# Altium PCB Sampler.PCBDOC (part 1 of 7)
Units mil, origin at the board's own origin, x right, y up, seen from the top; angles counter-clockwise.
Board outline 6299 x 3937 mil, 4 copper layers (Top, GP1(GND), L3, Bot), stack 64.883 mil thick; 567 components, 323 nets, 1698 pads, 817 vias.
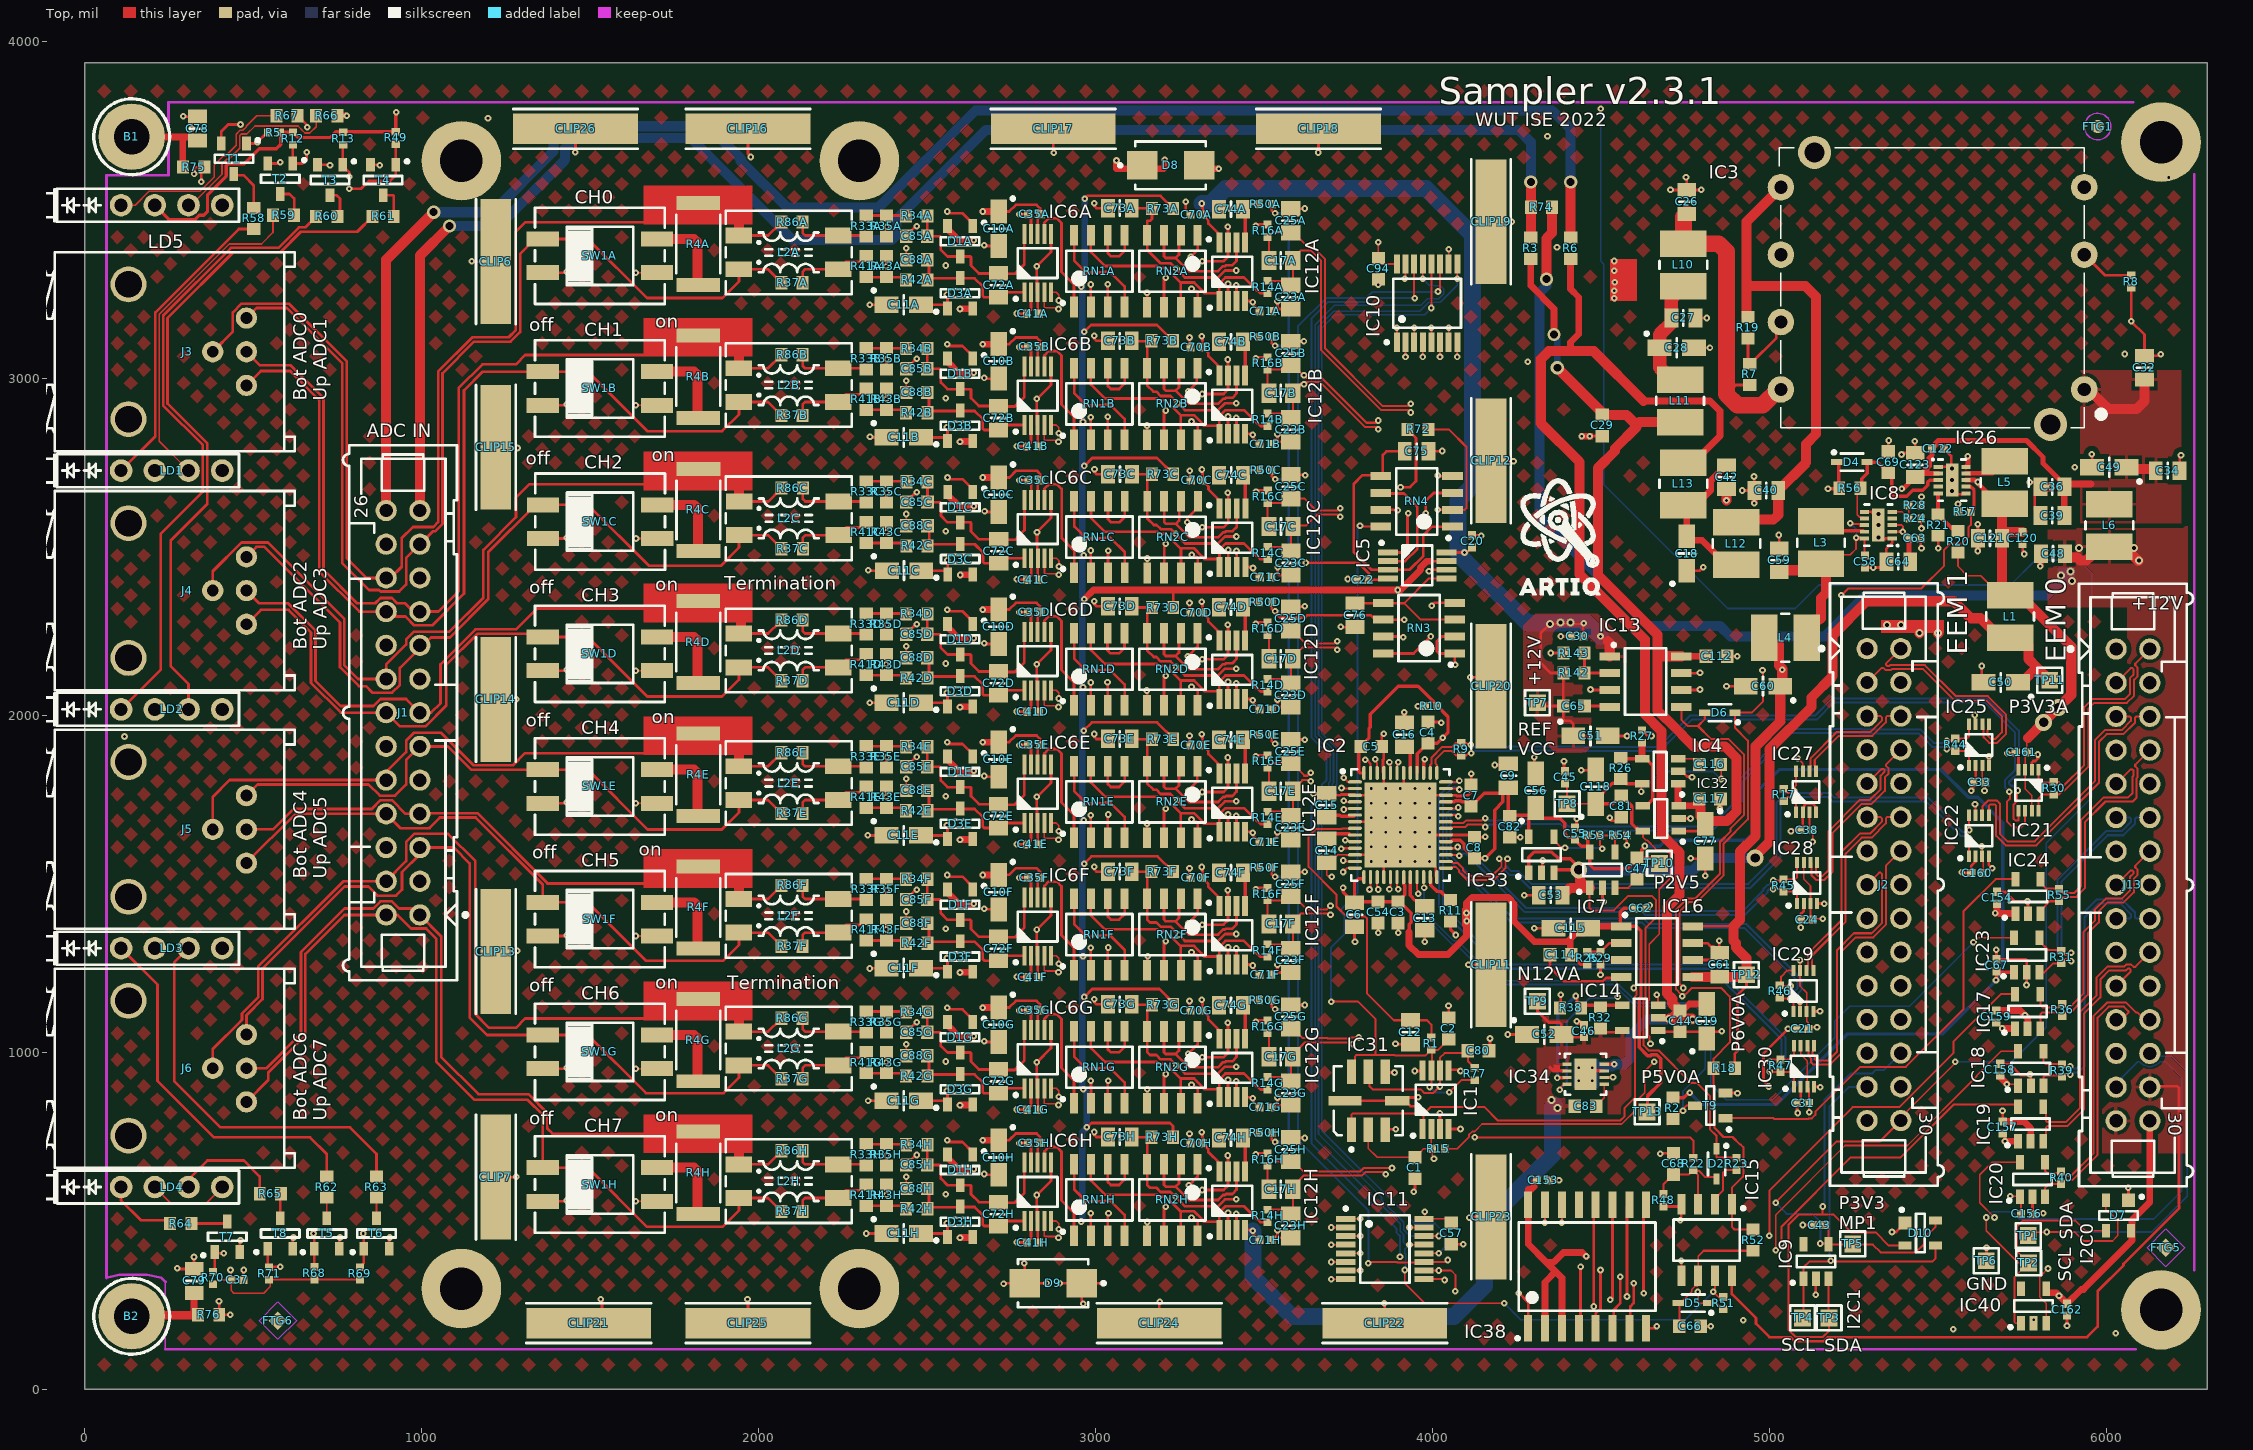
[diagram p0: Top view]
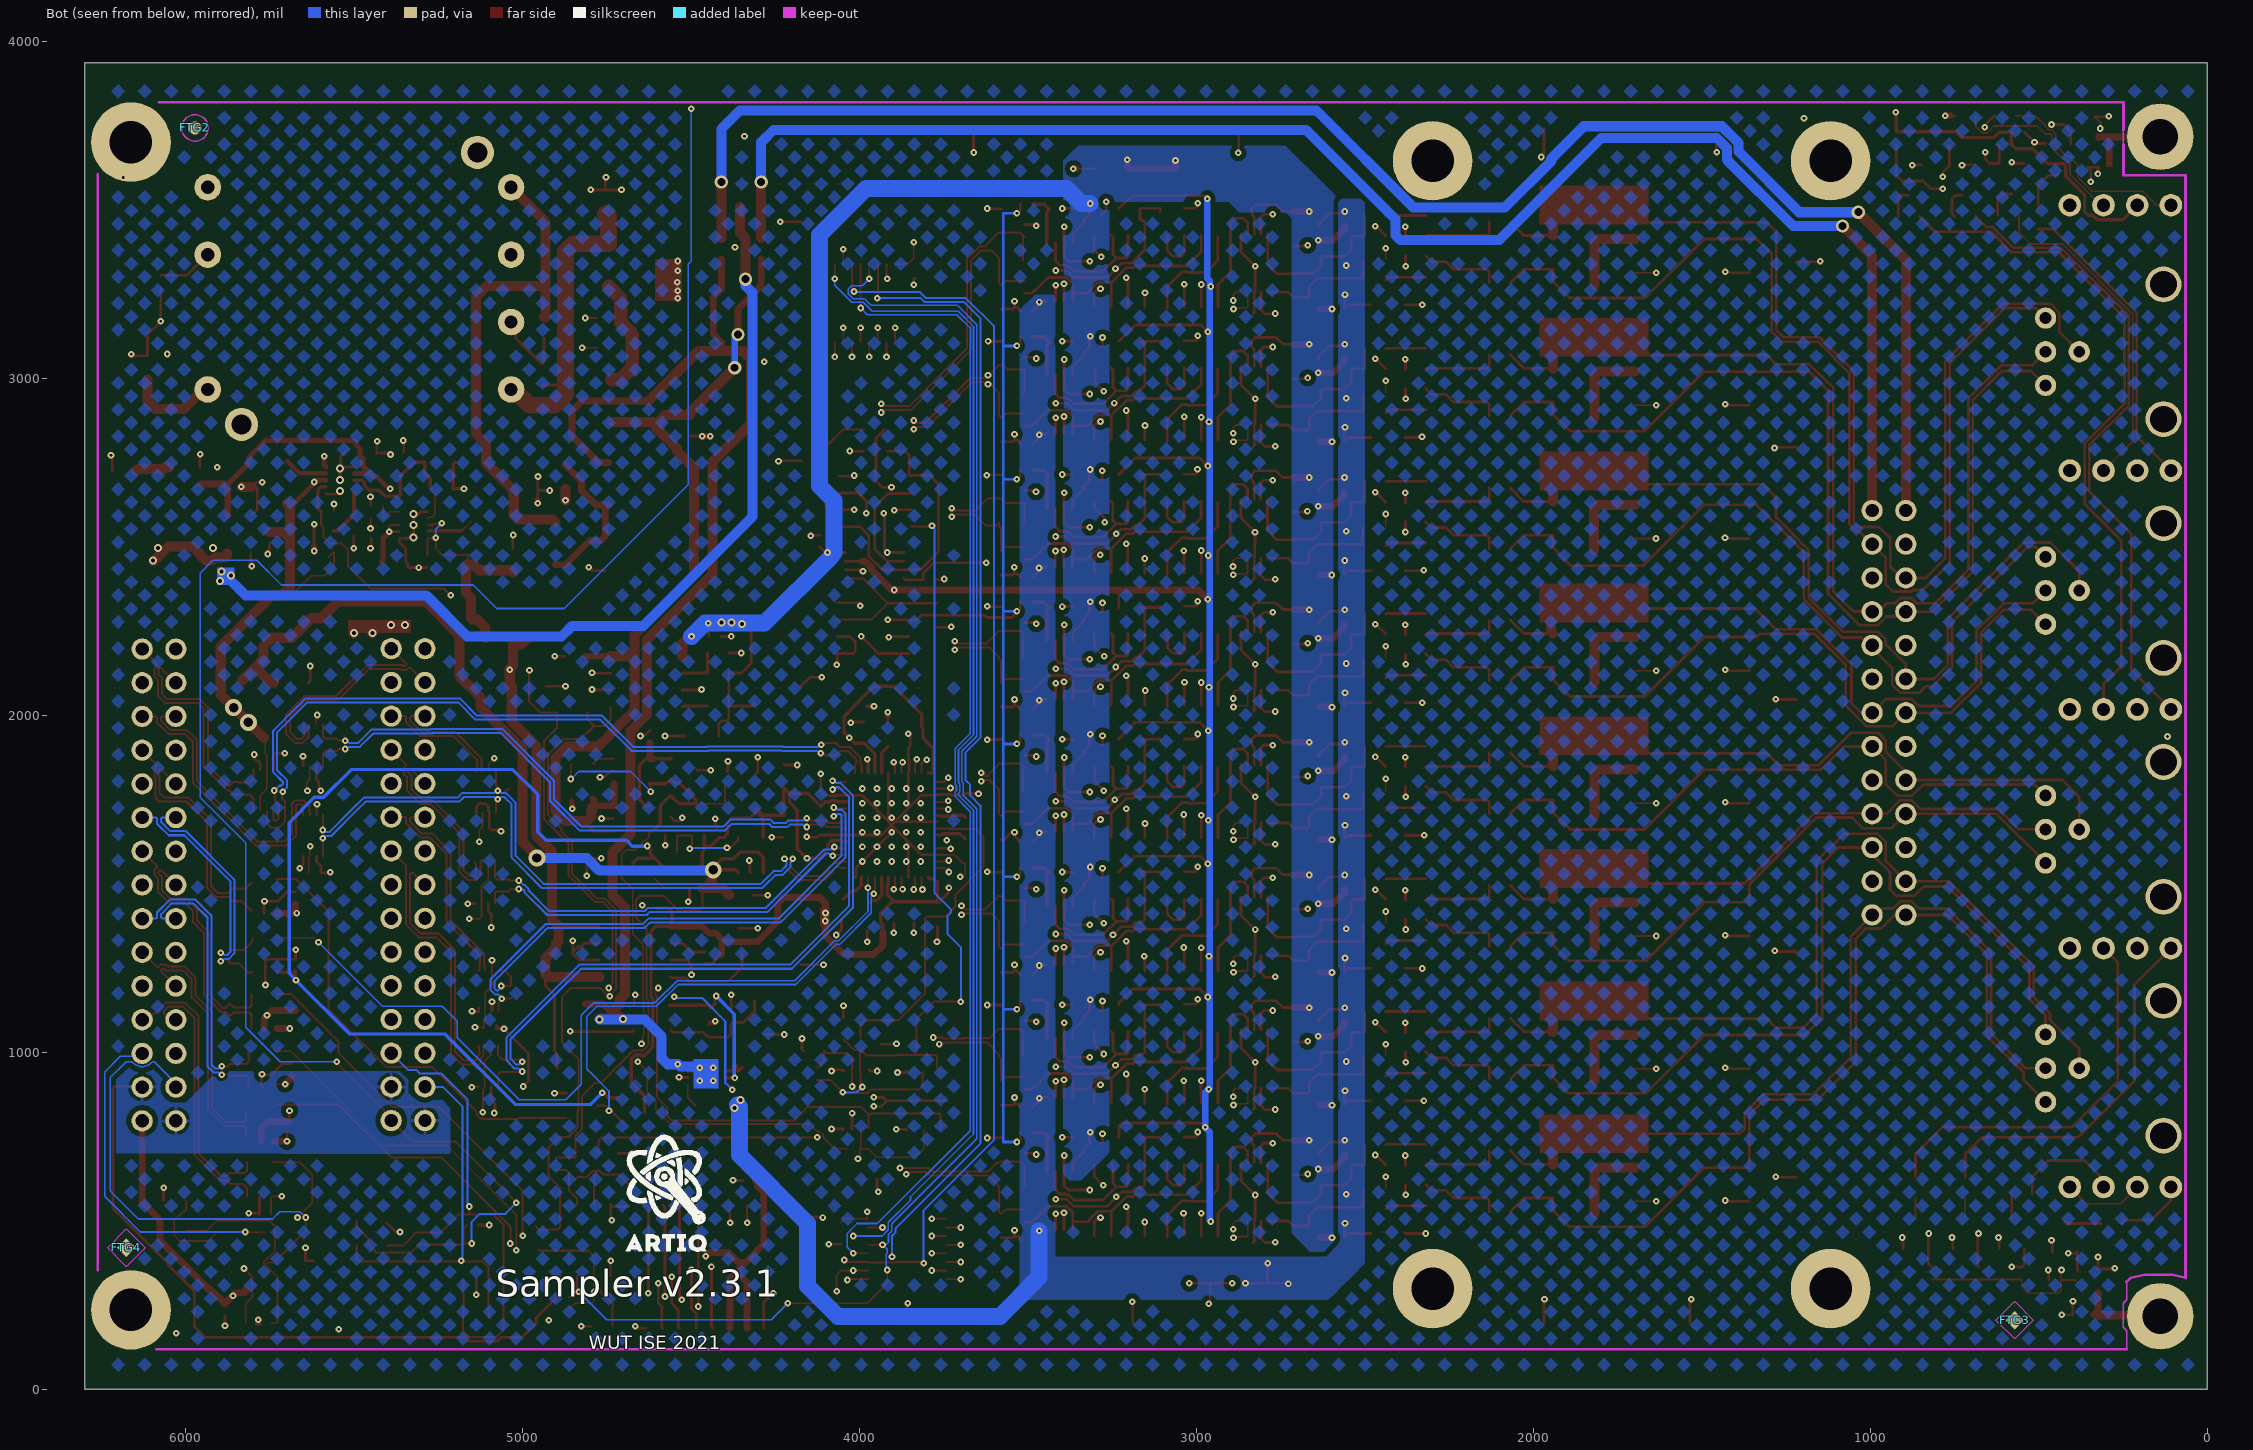
[diagram p1: Bot view, seen from below]
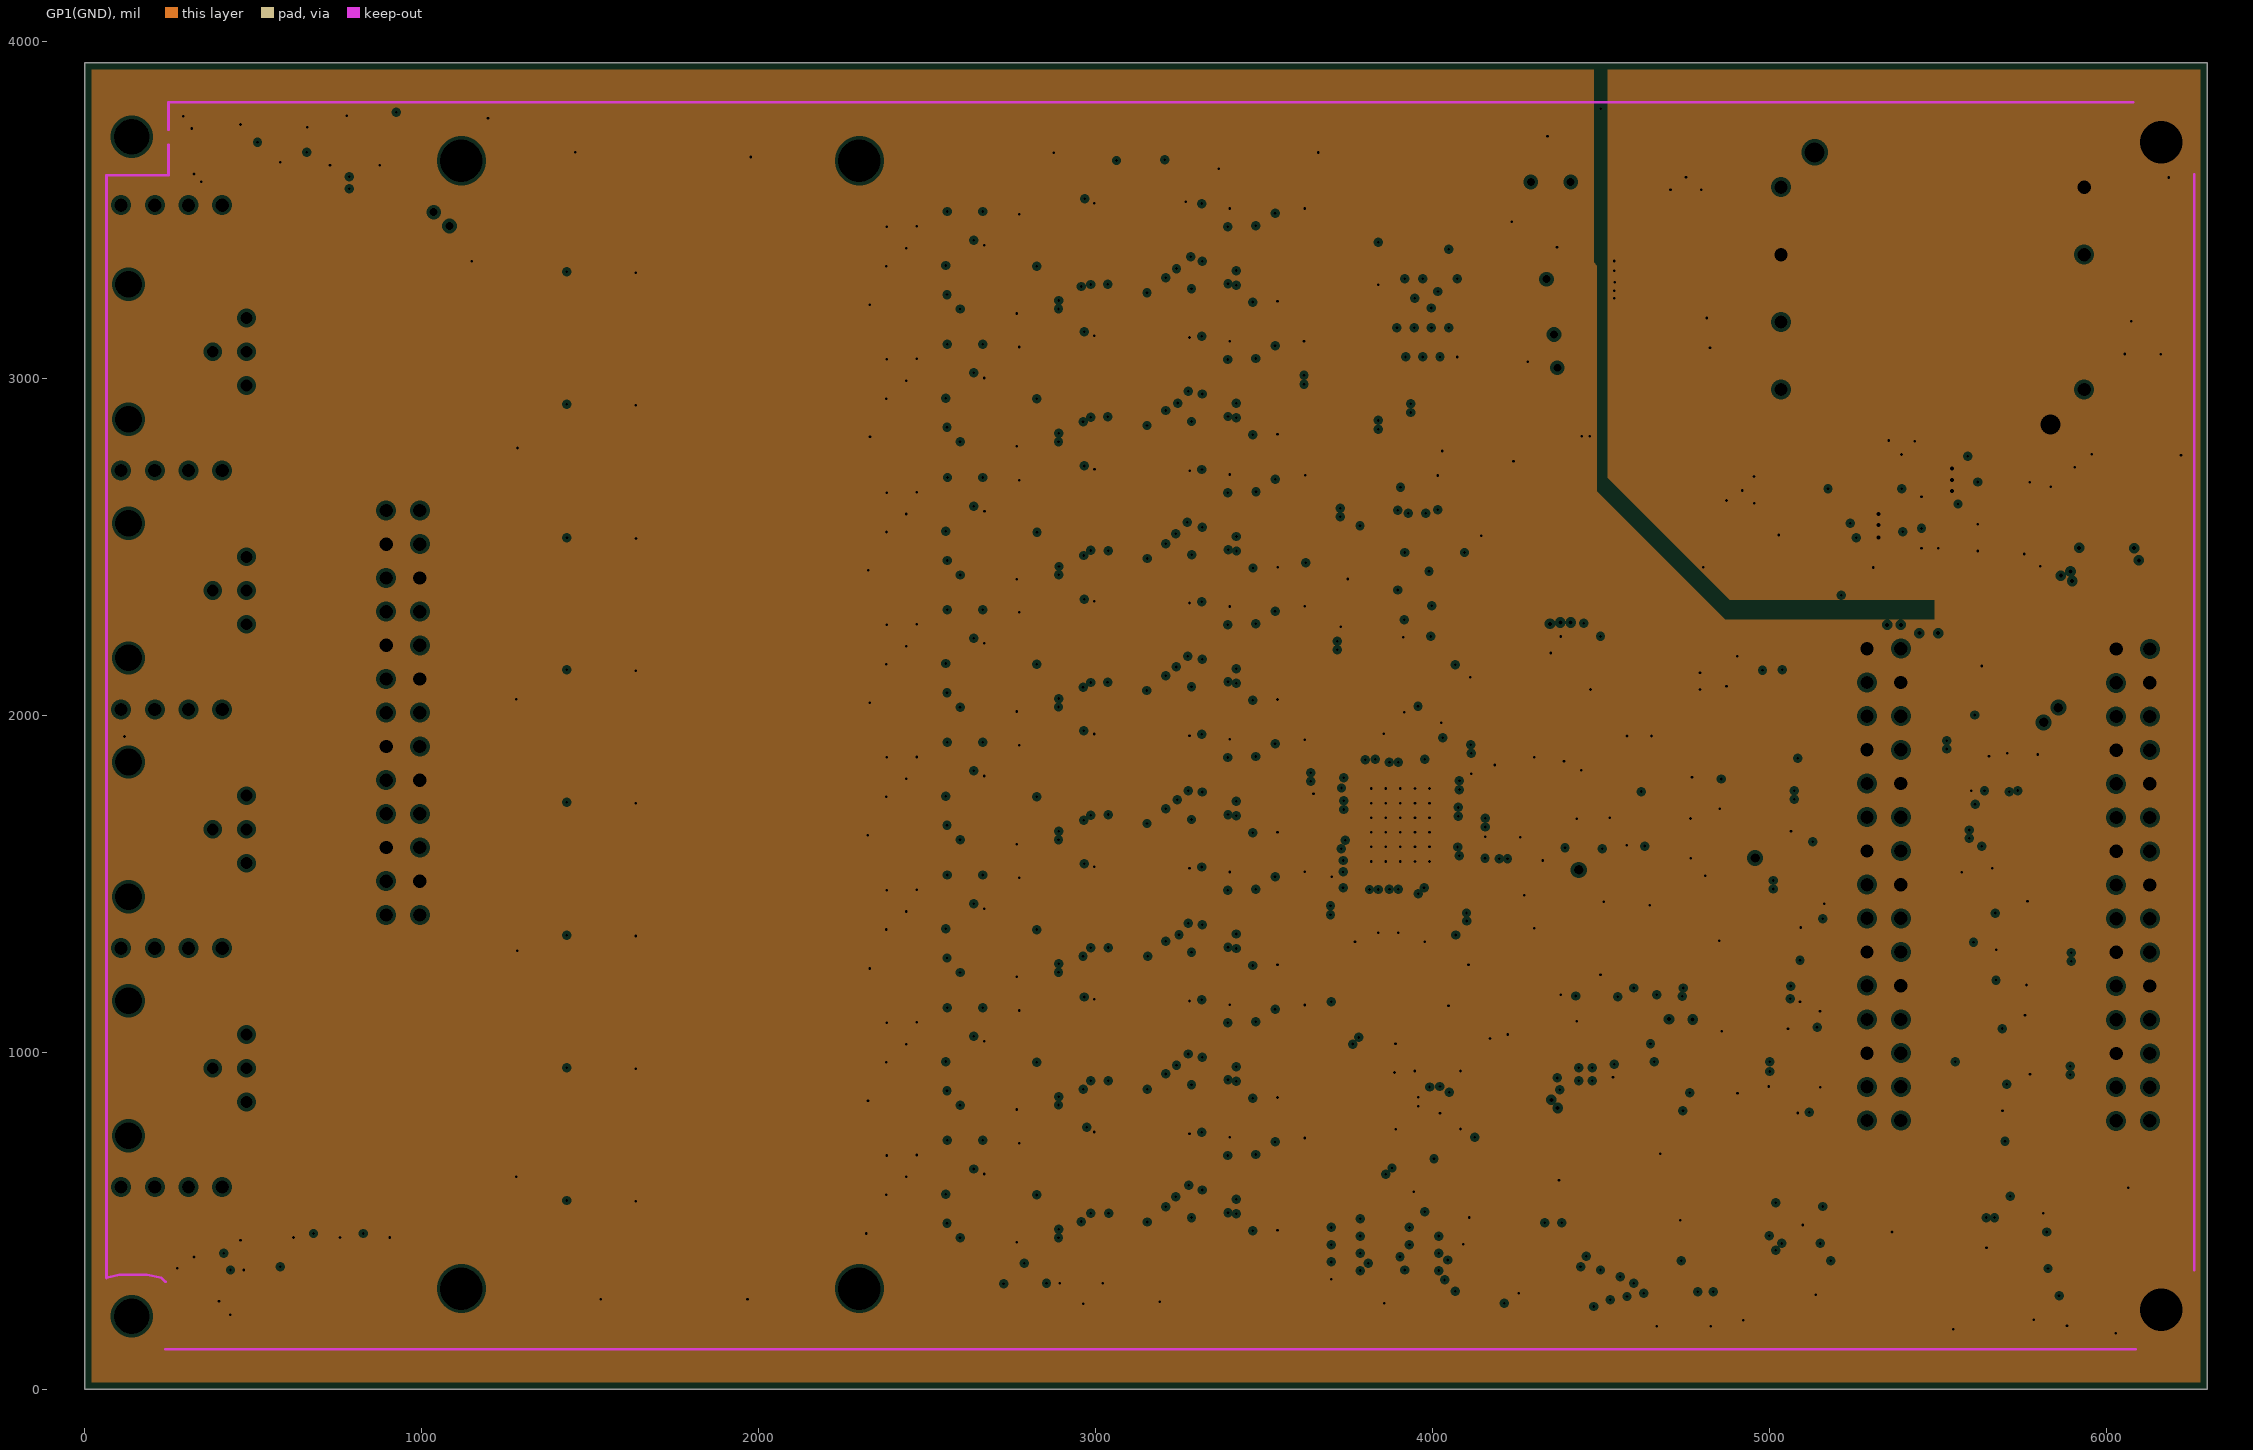
[diagram p2: GP1(GND), clearances drawn from the general rule]
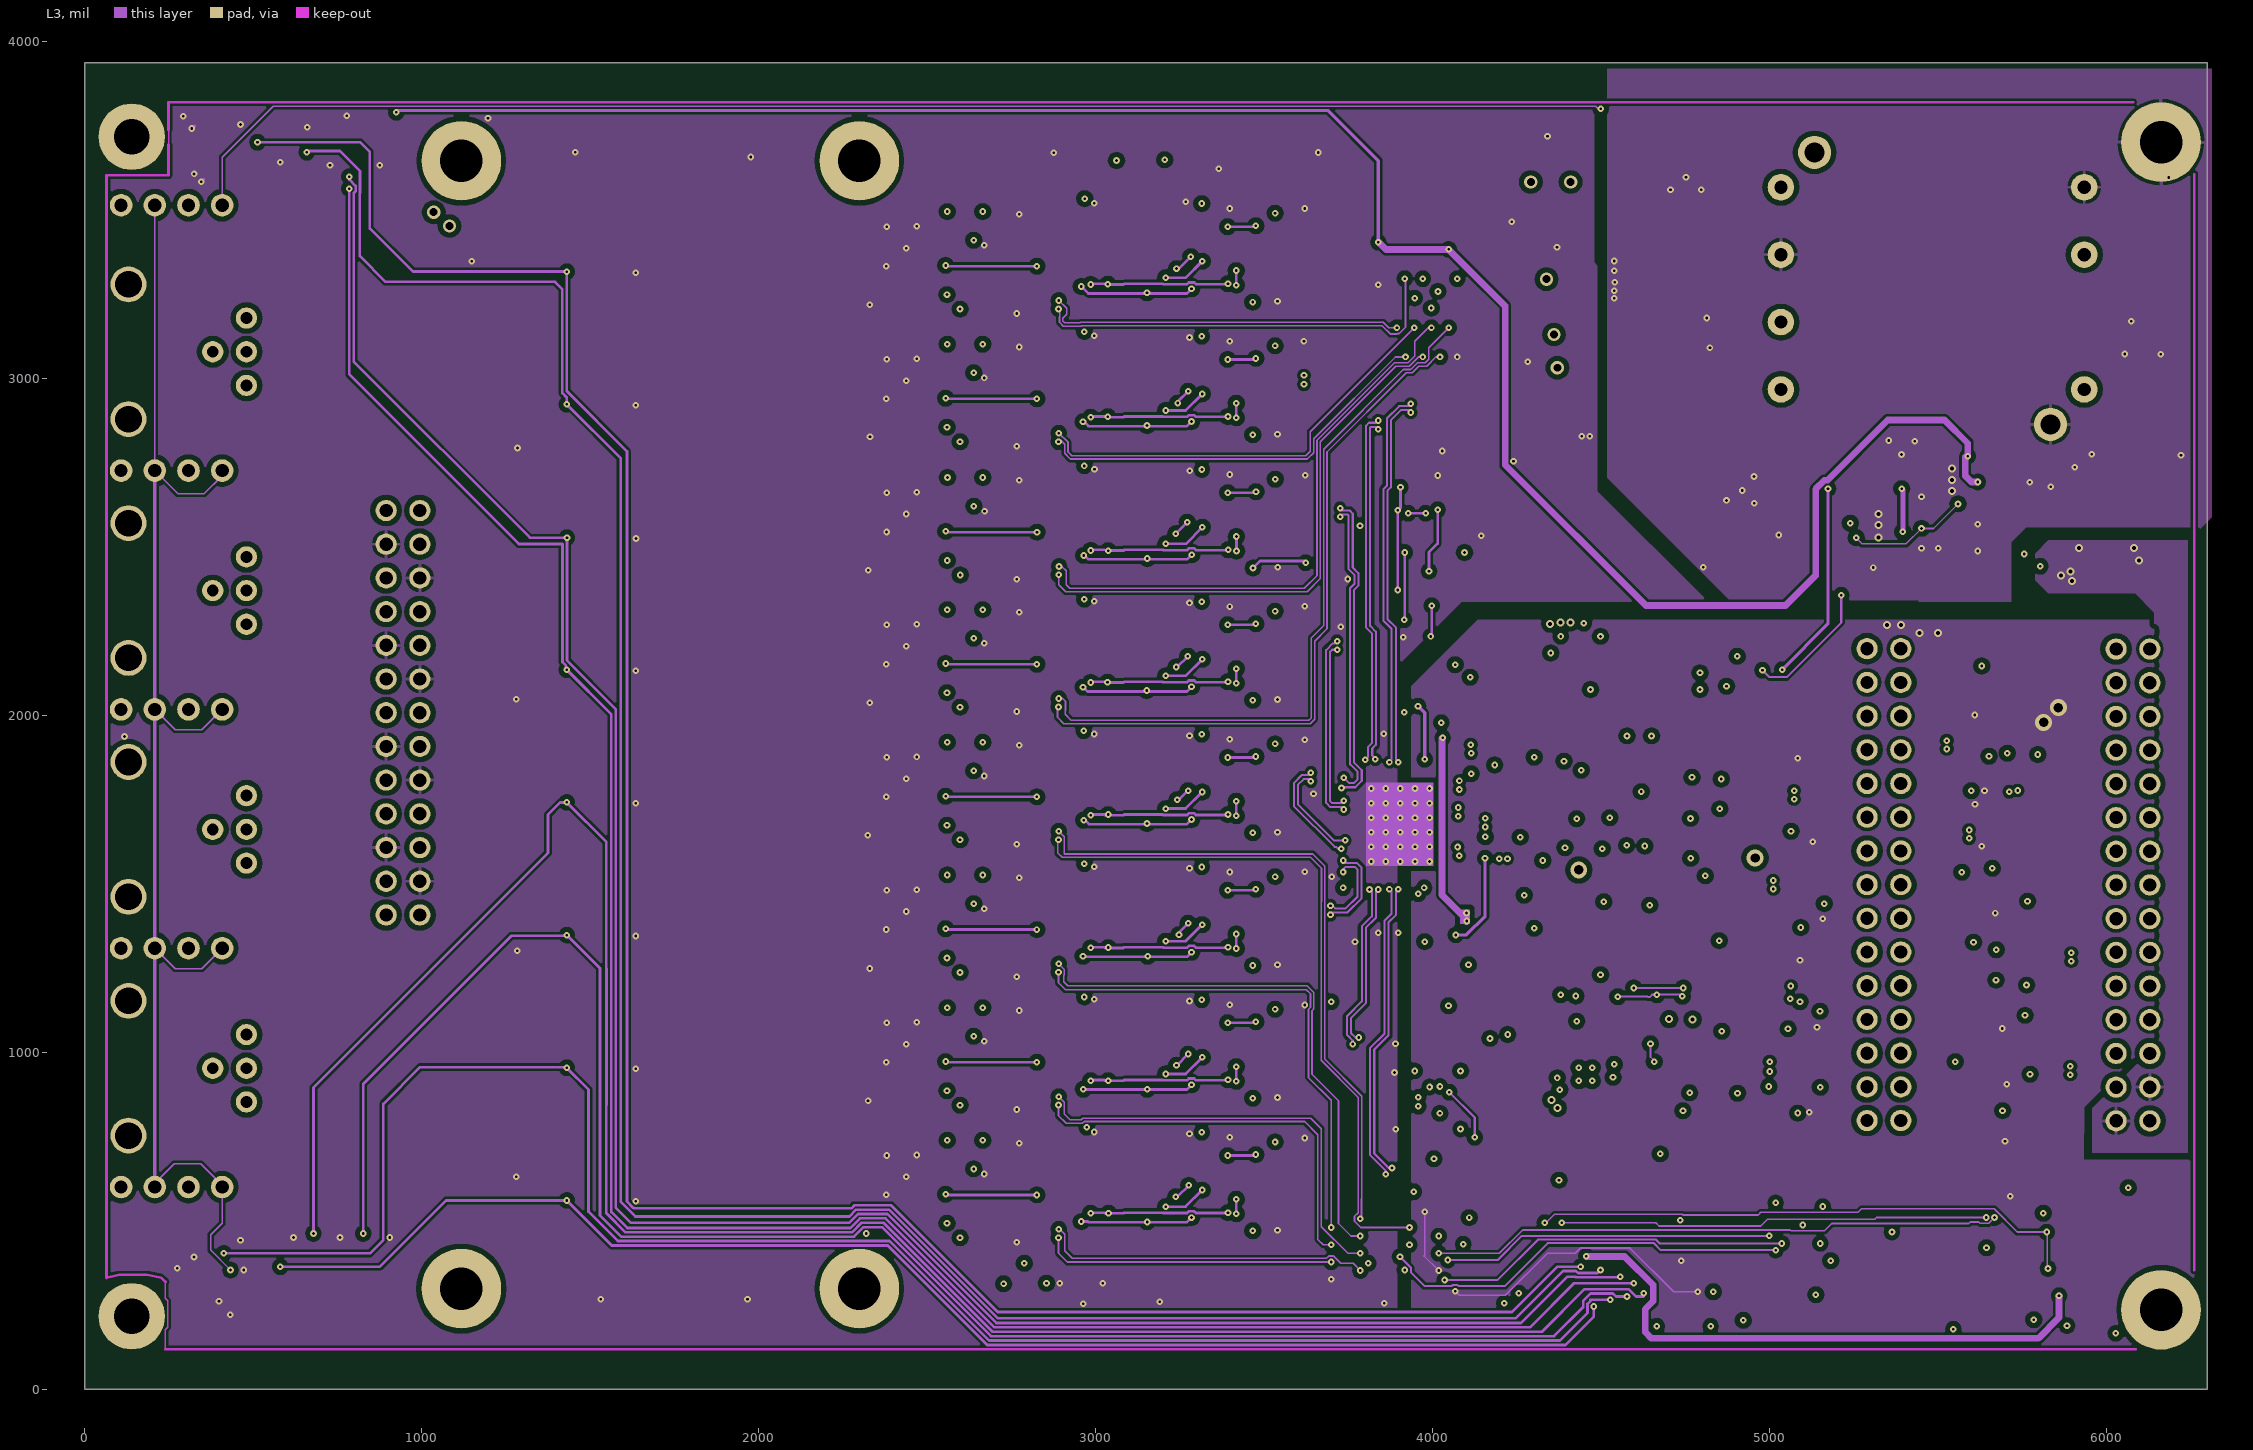
[diagram p3: L3]
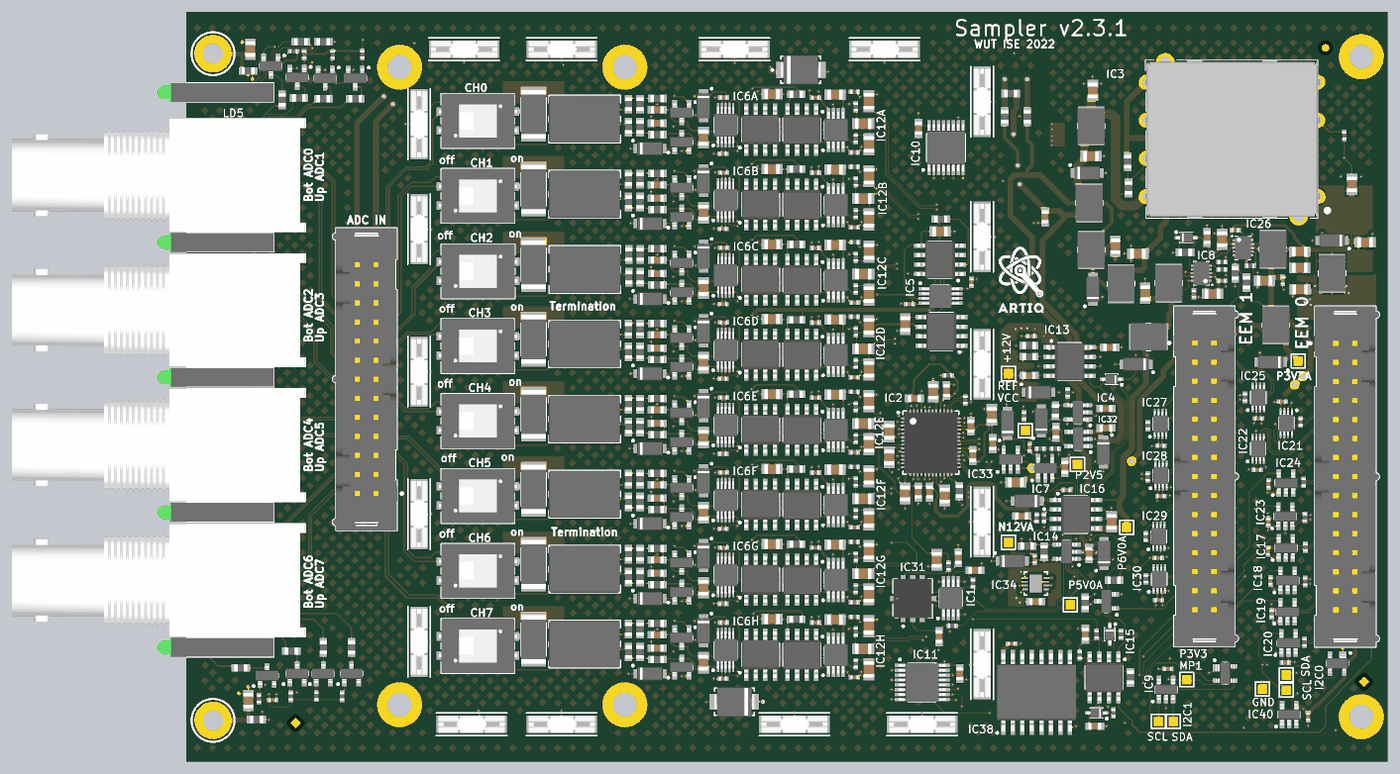
[diagram p9: 3D render of the assembled board from above, using the file's embedded part models]

## Layer stack, top to bottom
TopSolder: solder mask 0.4, Solder Resist, Dk 3.5
Top: signal copper 2.284
Dielectric1: core 7.087, FR-4, Dk 4.8
GP1(GND): plane copper 1.417, net GND
Dielectric 3: prepreg 43.307, Dk 4.2
L3: signal copper 1.417
Dielectric2: core 7.087, FR-4, Dk 4.2
Bot: signal copper 2.284
BottomSolder: solder mask 0.4, Solder Resist, Dk 3.5

## Board outline
0,0 6299,0 6299,3937 0,3937

## Design rules (kind name [scope] priority, off if disabled: settings)
AcuteAngle [All] p1: minimum=6.00000000000000E+0001 checktracksonly=FALSE
Clearance Clearance_DIFF [(InDifferentialPairClass('All Differential Pairs'))] p1: gap=5 ignorepadtopadclearanceinfootprint=FALSE except(0: Arc-Hole Track-Hole SMDPad-Hole THPad-Hole Via-Hole Fill-Hole Poly-Hole Region-Hole Text-Hole; 10: Arc-Poly Track-Poly SMDPad-Poly THPad-Poly Via-Poly Fill-Poly Poly-Poly Poly-Region Poly-Text)
Clearance [All] p2: gap=5 ignorepadtopadclearanceinfootprint=FALSE except(0: Arc-Hole Track-Hole SMDPad-Hole THPad-Hole Via-Hole Fill-Hole Poly-Hole Region-Hole Text-Hole; 8: Track-Poly; 15: Arc-Poly SMDPad-Poly THPad-Poly Via-Poly Fill-Poly Poly-Poly)
ComponentClearance [All] p1 off: gap=10 collisioncheckmode=3 verticalgap=10 showdistances=FALSE
DiffPairsRouting [All] p1: maxlimit=7 minlimit=6 mostfreqgap=6 toplayer_minwidth=5 toplayer_maxwidth=6 toplayer_prefwidth=6 midlayer1_minwidth=5 midlayer1_maxwidth=6 midlayer1_prefwidth=6 bottomlayer_minwidth=5 bottomlayer_maxwidth=6 bottomlayer_prefwidth=6 maxuncoupledlength=500
FabricationTestPointUsage TestPointUsage [All] p1: valid=0 allowmultiple=FALSE
FabricationTestpoint Testpoint [All] p1: side=3 testpointundercomponent=TRUE minsize=40 maxsize=100 preferedsize=60 minholesize=20 maxholesize=40 preferedholesize=32 testpointgrid=1 allowsidetop=TRUE allowsidebottom=TRUE usegrid=TRUE gridtolerance=0.01
Height [All] p1 off: minheight=0 maxheight=1000 prefheight=500
HoleSize [All] p1: absolutevalues=TRUE maxlimit=150 minlimit=1 maxpercent=80.000 minpercent=20.000
HoleToHoleClearance [All] p1: gap=1 allowstackedmicrovias=TRUE
MinimumSolderMaskSliver [All] p1: minsoldermaskwidth=0
PlaneClearance [All] p1: clearance=10
PlaneConnect [All] p1: planeconnectstyle=Direct reliefexpansion=20 reliefentries=4 reliefconductorwidth=10 reliefairgap=10
PolygonConnect PolygonConnect_pad [(InPadClass('All Pads'))] p1: connectstyle=Relief reliefconductorwidth=10 reliefentries=4 polygonreliefangle="90 Angle" airgapwidth=10
PolygonConnect [All] p2: connectstyle=Direct reliefconductorwidth=10 reliefentries=4 polygonreliefangle="45 Angle" airgapwidth=10
RoomDefinition Sampler [InComponentClass('Sampler')] p1 off: confinementstyle=ConfineIn formatcopy=TRUE lockcomponents=FALSE outline -4000,-6000 -2000,-6000 -2000,-5000 -4000,-5000
RoomDefinition U_LVDS_EEM1 [InComponentClass('U_LVDS_EEM1')] p2 off: confinementstyle=ConfineIn formatcopy=TRUE lockcomponents=FALSE outline 5639.76,0 6299.21,0 6299.21,2145.67 5639.76,2145.67
RoomDefinition U_LVDS_EEM0 [InComponentClass('U_LVDS_EEM0')] p3 off: confinementstyle=ConfineIn formatcopy=TRUE lockcomponents=FALSE outline 5639.76,2149.59 4862.2,2149.59 4862.2,0 5639.76,0
RoomDefinition U_Input_channel1 [InComponentClass('U_Input_channel1')] p4 off: confinementstyle=ConfineIn formatcopy=TRUE lockcomponents=FALSE outline 1023.62,3169.29 3622.05,3169.29 3622.05,3543.31 1023.62,3543.31
RoomDefinition U_Input_channel2 [InComponentClass('U_Input_channel2')] p5 off: confinementstyle=ConfineIn formatcopy=TRUE lockcomponents=FALSE outline 1023.62,2775.59 3622.05,2775.59 3622.05,3149.61 1023.62,3149.61
RoomDefinition U_Input_channel3 [InComponentClass('U_Input_channel3')] p6 off: confinementstyle=ConfineIn formatcopy=TRUE lockcomponents=FALSE outline 1024.12,2380.17 3622.54,2380.17 3622.54,2754.18 1024.12,2754.18
RoomDefinition U_Input_channel4 [InComponentClass('U_Input_channel4')] p7 off: confinementstyle=ConfineIn formatcopy=TRUE lockcomponents=FALSE outline 1023.62,1988.19 3622.05,1988.19 3622.05,2362.2 1023.62,2362.2
RoomDefinition U_Input_channel6 [InComponentClass('U_Input_channel6')] p8 off: confinementstyle=ConfineIn formatcopy=TRUE lockcomponents=FALSE outline 1023.62,1200.79 3622.05,1200.79 3622.05,1574.8 1023.62,1574.8
RoomDefinition U_Input_channel8 [InComponentClass('U_Input_channel8')] p9 off: confinementstyle=ConfineIn formatcopy=TRUE lockcomponents=FALSE outline 1023.62,413.39 3622.05,413.39 3622.05,787.4 1023.62,787.4
RoomDefinition U_Supply [InComponentClass('U_Supply')] p10 off: confinementstyle=ConfineIn formatcopy=TRUE lockcomponents=FALSE outline 3817,2261.83 6218,2261.83 6218,3787 3817,3787
RoomDefinition U_Input_channel5 [InComponentClass('U_Input_channel5')] p11 off: confinementstyle=ConfineIn formatcopy=TRUE lockcomponents=FALSE outline 1023.62,1594.49 3622.05,1594.49 3622.05,1968.5 1023.62,1968.5
RoomDefinition U_ADC_8CH [InComponentClass('U_ADC_8CH')] p12 off: confinementstyle=ConfineIn formatcopy=TRUE lockcomponents=FALSE outline 3044.71,1390 3726,1390 3726,2528.83 3044.71,2528.83
RoomDefinition U_Input_channel7 [InComponentClass('U_Input_channel7')] p13 off: confinementstyle=ConfineIn formatcopy=TRUE lockcomponents=FALSE outline 1023.62,807.09 3622.05,807.09 3622.05,1181.1 1023.62,1181.1
RoutingVias [All] p1: holewidth=7.87 width=19.68 viastyle="Through Hole" minholewidth=7.87 minwidth=19.68 maxholewidth=28 maxwidth=50
SilkToSilkClearance [All] p1: silktosilkclearance=0
SilkToSolderMaskClearance SilkscreenOverComponentPads [IsPad] p1: minsilkscreentomaskgap=0 clearancetoexposedcopper=TRUE
SolderMaskExpansion [All] p1: expansion=2 istentingtop=FALSE
Width [All] p1: maxlimit=50 minlimit=5 preferedwidth=5
18 further rules are at their usual default settings.

## Classes and differential pairs
component class U_LVDS_EEM1: C21 C24 C31 C33 C37 C38 C43 D10 IC9 IC25 IC27 IC28 IC29 IC30 J2 R17 R44 R45 R46 R47 TP3 TP4 TP5 TP6
net class TERM_STAT[7..0]: TERM_STAT0 TERM_STAT1 TERM_STAT2 TERM_STAT3 TERM_STAT4 TERM_STAT5 TERM_STAT6 TERM_STAT7
channel class Input_channel: U_Input_channel1 U_Input_channel2 U_Input_channel3 U_Input_channel4 U_Input_channel5 U_Input_channel6 U_Input_channel7 U_Input_channel8
component class U_Supply: C18 C19 C26 C27 C28 C29 C30 C32 C34 C36 C39 C40 C42 C44 C45 C46 C47 C48 C49 C50 C51 C52 C53 C55 C56 C58 C59 C60 C61 C62 C63 C64 C65 C66 C68 C69 C77 C81 C82 C83 C112 C114 C115 C116 C117 C118 C120 C121 C122 C123 D2 D4 D5 D6 D8 D9 IC3 IC4 IC7 IC8 IC13 IC14 IC15 IC16 IC26 IC32 IC33 IC34 L1 L3 L4 L5 L6 L10 L11 L12 L13 R7 R8 R18 R19 R20 R21 R22 R23 R24 R25 R26 R27 R28 R29 R32 R38 R48 R51 R52 R53 R54 R56 R57 R142 R143 TP7 TP8 TP9 TP10 TP11 TP12 TP13
component class U_Input_channel8: C10H C11H C17H C23H C25H C35H C41H C70H C71H C72H C73H C74H C85H C88H D1H D3H IC6H IC12H L2H R4H R14H R16H R33H R34H R35H R37H R41H R42H R43H R50H R73H R86H RN1H RN2H SW1H
component class U_Input_channel7: C10G C11G C17G C23G C25G C35G C41G C70G C71G C72G C73G C74G C85G C88G D1G D3G IC6G IC12G L2G R4G R14G R16G R33G R34G R35G R37G R41G R42G R43G R50G R73G R86G RN1G RN2G SW1G
component class U_Input_channel6: C10F C11F C17F C23F C25F C35F C41F C70F C71F C72F C73F C74F C85F C88F D1F D3F IC6F IC12F L2F R4F R14F R16F R33F R34F R35F R37F R41F R42F R43F R50F R73F R86F RN1F RN2F SW1F
component class U_Input_channel5: C10E C11E C17E C23E C25E C35E C41E C70E C71E C72E C73E C74E C85E C88E D1E D3E IC6E IC12E L2E R4E R14E R16E R33E R34E R35E R37E R41E R42E R43E R50E R73E R86E RN1E RN2E SW1E
component class U_Input_channel4: C10D C11D C17D C23D C25D C35D C41D C70D C71D C72D C73D C74D C85D C88D D1D D3D IC6D IC12D L2D R4D R14D R16D R33D R34D R35D R37D R41D R42D R43D R50D R73D R86D RN1D RN2D SW1D
component class U_Input_channel3: C10C C11C C17C C23C C25C C35C C41C C70C C71C C72C C73C C74C C85C C88C D1C D3C IC6C IC12C L2C R4C R14C R16C R33C R34C R35C R37C R41C R42C R43C R50C R73C R86C RN1C RN2C SW1C
component class U_Input_channel2: C10B C11B C17B C23B C25B C35B C41B C70B C71B C72B C73B C74B C85B C88B D1B D3B IC6B IC12B L2B R4B R14B R16B R33B R34B R35B R37B R41B R42B R43B R50B R73B R86B RN1B RN2B SW1B
component class U_Input_channel1: C10A C11A C17A C23A C25A C35A C41A C70A C71A C72A C73A C74A C85A C88A D1A D3A IC6A IC12A L2A R4A R14A R16A R33A R34A R35A R37A R41A R42A R43A R50A R73A R86A RN1A RN2A SW1A
component class U_ADC_8CH: C1 C2 C3 C4 C5 C6 C7 C8 C9 C12 C13 C14 C15 C16 C20 C22 C54 C75 C76 C80 IC1 IC2 IC5 IC31 R1 R2 R9 R10 R11 R15 R72 R77 RN3 RN4 T9
component class Sampler: B1 B2 C57 C78 C79 C94 CLIP6 CLIP7 CLIP11 CLIP12 CLIP13 CLIP14 CLIP15 CLIP16 CLIP17 CLIP18 CLIP19 CLIP20 CLIP21 CLIP22 CLIP23 CLIP24 CLIP25 CLIP26 FTG1 FTG2 FTG3 FTG4 FTG5 FTG6 IC10 IC11 J1 J3 J4 J5 J6 LD1 LD2 LD3 LD4 LD5 NUT1 NUT2 NUT3 NUT4 NUT5 NUT6 NUT7 NUT8 R3 R5 R6 R12 R13 R49 R58 R59 R60 R61 R62 R63 R64 R65 R66 R67 R68 R69 R70 R71 R74 R75 R76 T1 T2 T3 T4 T5 T6 T7 T8 WASHER1 WASHER2 WASHER3 WASHER4 WASHER5 WASHER6 WASHER7 WASHER8
component class U_LVDS_EEM0: C67 C153 C154 C156 C157 C158 C159 C160 C161 C162 D7 IC17 IC18 IC19 IC20 IC21 IC22 IC23 IC24 IC38 IC40 J13 R30 R31 R36 R39 R40 R55 TP1 TP2
differential pair EEM1_7: +EEM1_7_P -EEM1_7_N
differential pair EEM1_6: +EEM1_6_P -EEM1_6_N
differential pair EEM1_5: +EEM1_5_P -EEM1_5_N
differential pair EEM1_4: +EEM1_4_P -EEM1_4_N
differential pair EEM1_3: +EEM1_3_P -EEM1_3_N
differential pair EEM1_2: +EEM1_2_P -EEM1_2_N
differential pair EEM1_1: +EEM1_1_P -EEM1_1_N
differential pair EEM1_0: +EEM1_0_P -EEM1_0_N
differential pair EEM0_7: +EEM0_7_P -EEM0_7_N
differential pair EEM0_6: +EEM0_6_P -EEM0_6_N
differential pair EEM0_5: +EEM0_5_P -EEM0_5_N
differential pair EEM0_4: +EEM0_4_P -EEM0_4_N
differential pair EEM0_3: +EEM0_3_P -EEM0_3_N
differential pair EEM0_2: +EEM0_2_P -EEM0_2_N
differential pair EEM0_1: +EEM0_1_P -EEM0_1_N
differential pair EEM0_0: +EEM0_0_P -EEM0_0_N
differential pair ADC_CLKOUT: +ADC_CLKOUT_P -ADC_CLKOUT_N
differential pair ADC_SCK: +ADC_SCK_P -ADC_SCK_N
differential pair ADC_SDOA: +ADC_SDOA_P -ADC_SDOA_N
differential pair ADC_SDOB: +ADC_SDOB_P -ADC_SDOB_N
differential pair ADC_SDOC: +ADC_SDOC_P -ADC_SDOC_N
differential pair ADC_SDOD: +ADC_SDOD_P -ADC_SDOD_N
differential pair IN_0: +IN_0_P -IN_0_N
differential pair IN_1: +IN_1_P -IN_1_N
differential pair IN_2: +IN_2_P -IN_2_N
differential pair IN_3: +IN_3_P -IN_3_N
differential pair IN_4: +IN_4_P -IN_4_N
differential pair IN_5: +IN_5_P -IN_5_N
differential pair IN_6: +IN_6_P -IN_6_N
differential pair IN_7: +IN_7_P -IN_7_N

## Components (designator, comment, footprint, x,y, rotation, side; value= is the part's Value field where it differs from the comment)
B1 "Plated Hole" MTG270_500 140,3717 r0 top
B2 "Plated Hole" MTG270_500 140,217 r0 top
C1 "1uF" CAPC1608X87N 3947.64,656.94 r90 top
C2 "2.2uF" CAPC1608X87N 4048.23,1070.87 r270 top
C3 "100nF" CAPC1608X87N 3897.17,1415.55 r90 top
C4 "100nF" CAPC1608X87N 3986.22,1948.82 r270 top
C5 "100nF" CAPC1608X87N 3817.91,1907.48 r180 top
C6 "10uF" CAPC2012X95N 3768.17,1408.55 r90 top
C7 "100nF" CAPC1608X87N 4114.17,1761.81 r270 top
C8 "100nF" CAPC1608X87N 4124.02,1607.28 r270 top
C9 "10uF" CAPC2012X95N 4224.72,1820.87 r270 top
C10A "10uF" CAPMP3216X180N 2712,3444 r270 top (schematic designator C10)
C10B "10uF" CAPMP3216X180N 2712,3050.3 r270 top (schematic designator C10)
C10C "10uF" CAPMP3216X180N 2712.49,2654.87 r270 top (schematic designator C10)
C10D "10uF" CAPMP3216X180N 2712,2262.9 r270 top (schematic designator C10)
C10E "10uF" CAPMP3216X180N 2712,1869.2 r270 top (schematic designator C10)
C10F "10uF" CAPMP3216X180N 2712,1475.5 r270 top (schematic designator C10)
C10G "10uF" CAPMP3216X180N 2712,1081.8 r270 top (schematic designator C10)
C10H "10uF" CAPMP3216X180N 2712,688.09 r270 top (schematic designator C10)
C11A "10uF" CAPMP3216X180N 2431.1,3218.5 r0 top (schematic designator C11)
C11B "10uF" CAPMP3216X180N 2431.1,2824.8 r0 top (schematic designator C11)
C11C "10uF" CAPMP3216X180N 2431.6,2429.38 r0 top (schematic designator C11)
C11D "10uF" CAPMP3216X180N 2431.1,2037.4 r0 top (schematic designator C11)
C11E "10uF" CAPMP3216X180N 2431.1,1643.7 r0 top (schematic designator C11)
C11F "10uF" CAPMP3216X180N 2431.1,1250 r0 top (schematic designator C11)
C11G "10uF" CAPMP3216X180N 2431.1,856.3 r0 top (schematic designator C11)
C11H "10uF" CAPMP3216X180N 2431.1,462.6 r0 top (schematic designator C11)
C12 "10uF" CAPC2012X95N 3934.24,1059.91 r90 top
C13 "10uF" CAPC2012X95N 3976.38,1397.64 r90 top
C14 "10uF" CAPC2012X95N 3686.02,1597.89 r90 top
C15 "10uF" CAPC2012X95N 3686.02,1732.89 r270 top
C16 "10uF" CAPC2012X95N 3916.17,1942.55 r270 top
C17A "2.2nF" CAPC2013X100N 3549.57,3349.46 r0 top (schematic designator C17)
C17B "2.2nF" CAPC2013X100N 3549.57,2955.76 r0 top (schematic designator C17)
C17C "2.2nF" CAPC2013X100N 3550.07,2560.33 r0 top (schematic designator C17)
C17D "2.2nF" CAPC2013X100N 3549.57,2168.35 r0 top (schematic designator C17)
C17E "2.2nF" CAPC2013X100N 3549.57,1774.65 r0 top (schematic designator C17)
C17F "2.2nF" CAPC2013X100N 3549.57,1380.95 r0 top (schematic designator C17)
C17G "2.2nF" CAPC2013X100N 3549.57,987.25 r0 top (schematic designator C17)
C17H "2.2nF" CAPC2013X100N 3549.57,593.55 r0 top (schematic designator C17)
C18 "10uF" CAPMP3216X180N 4753.94,2480.32 r90 top
C19 "10uF" CAPMP3216X180N 4812.99,1092.52 r90 top
C20 "100nF" CAPC1005X55N 4117.13,2516.73 r270 top
C21 "100nF" CAPC1005X55N 5097.08,1069.76 r0 top
C22 "100nF" CAPC1005X55N 3792.32,2402.56 r0 top
C23A "2.2nF" CAPC2013X100N 3579.1,3241.19 r90 top (schematic designator C23)
C23B "2.2nF" CAPC2013X100N 3579.1,2847.49 r90 top (schematic designator C23)
C23C "2.2nF" CAPC2013X100N 3579.6,2452.06 r90 top (schematic designator C23)
C23D "2.2nF" CAPC2013X100N 3579.1,2060.09 r90 top (schematic designator C23)
C23E "2.2nF" CAPC2013X100N 3579.1,1666.39 r90 top (schematic designator C23)
C23F "2.2nF" CAPC2013X100N 3579.1,1272.69 r90 top (schematic designator C23)
C23G "2.2nF" CAPC2013X100N 3579.1,878.98 r90 top (schematic designator C23)
C23H "2.2nF" CAPC2013X100N 3579.1,485.28 r90 top (schematic designator C23)
C24 "100nF" CAPC1005X55N 5109.9,1394.14 r0 top
C25A "2.2nF" CAPC2013X100N 3579.1,3467.57 r90 top (schematic designator C25)
C25B "2.2nF" CAPC2013X100N 3579.1,3073.87 r90 top (schematic designator C25)
C25C "2.2nF" CAPC2013X100N 3579.6,2678.44 r90 top (schematic designator C25)
C25D "2.2nF" CAPC2013X100N 3579.1,2286.46 r90 top (schematic designator C25)
C25E "2.2nF" CAPC2013X100N 3579.1,1892.76 r90 top (schematic designator C25)
C25F "2.2nF" CAPC2013X100N 3579.1,1499.06 r90 top (schematic designator C25)
C25G "2.2nF" CAPC2013X100N 3579.1,1105.36 r90 top (schematic designator C25)
C25H "2.2nF" CAPC2013X100N 3579.1,711.66 r90 top (schematic designator C25)
C26 "22uF" CAPC2012X135N 4753.94,3523.62 r270 top
C27 "22uF" CAPC2012X135N 4744.09,3179.13 r180 top
C28 "10uF" CAPMP3216X180N 4724.41,3090.55 r0 top
C29 "1uF" CAPC1608X87N 4502.95,2860.24 r90 top
C30 "100nF" CAPC1005X55N 4429.13,2234.25 r0 top
C31 "100nF" CAPC1005X55N 5098.83,849.43 r0 top
C32 "22uF" CAPC2012X135N 6112.2,3031.5 r270 top
C33 "100nF" CAPC1005X55N 5621.87,1801.65 r0 top
C34 "22uF" CAPC2012X135N 6181.1,2726.38 r180 top
C35A "100nF" CAPC1005X55N 2817.76,3486.94 r0 top (schematic designator C35)
C35B "100nF" CAPC1005X55N 2817.76,3093.23 r0 top (schematic designator C35)
C35C "100nF" CAPC1005X55N 2818.26,2697.81 r0 top (schematic designator C35)
C35D "100nF" CAPC1005X55N 2817.76,2305.83 r0 top (schematic designator C35)
C35E "100nF" CAPC1005X55N 2817.76,1912.14 r0 top (schematic designator C35)
C35F "100nF" CAPC1005X55N 2817.76,1518.43 r0 top (schematic designator C35)
C35G "100nF" CAPC1005X55N 2817.76,1124.73 r0 top (schematic designator C35)
C35H "100nF" CAPC1005X55N 2817.76,731.03 r0 top (schematic designator C35)
C36 "22uF" CAPC2012X135N 5838.94,2678 r0 top
C37 "100nF" CAPC1005X55N 452.76,324.8 r180 top
C38 "100nF" CAPC1005X55N 5109.69,1659.81 r0 top
C39 "22uF" CAPC2012X135N 5838.94,2593 r0 top
C40 "22uF" CAPC2012X135N 4990.16,2667.32 r0 top
C41A "100nF" CAPC1005X55N 2813.83,3191.66 r0 top (schematic designator C41)
C41B "100nF" CAPC1005X55N 2813.83,2797.96 r0 top (schematic designator C41)
C41C "100nF" CAPC1005X55N 2814.32,2402.54 r0 top (schematic designator C41)
C41D "100nF" CAPC1005X55N 2813.83,2010.56 r0 top (schematic designator C41)
C41E "100nF" CAPC1005X55N 2813.83,1616.86 r0 top (schematic designator C41)
C41F "100nF" CAPC1005X55N 2813.83,1223.16 r0 top (schematic designator C41)
C41G "100nF" CAPC1005X55N 2813.83,829.46 r0 top (schematic designator C41)
C41H "100nF" CAPC1005X55N 2813.83,435.76 r0 top (schematic designator C41)
C42 "22uF" CAPC2012X135N 4872.05,2706.69 r90 top
C43 "100nF" CAPC1005X55N 5147.1,487.63 r0 top
C44 "1uF" CAPC1608X87N 4734.25,1092.52 r90 top
C45 "100nF" CAPC1005X55N 4392.8,1816.34 r270 top
C46 "100nF" CAPC1005X55N 4448.82,1062.99 r270 top
C47 "10nF" CAPC1608X87N 4606.3,1545.28 r90 top
C48 "22uF" CAPC2012X135N 5840.94,2480 r0 top
C49 "10uF" CAPMP3216X180N 6008.03,2736.22 r180 top
C50 "10uF" CAPMP3216X180N 5686.04,2097.79 r180 top
C51 "10uF" CAPMP3216X180N 4468.5,1938.98 r0 top
C52 "10uF" CAPMP3216X180N 4330.71,1053.15 r0 top
C53 "22uF" CAPC2012X135N 4350.39,1466.54 r0 top
C54 "100nF" CAPC1608X87N 3838.17,1415.55 r90 top
C55 "100nF" CAPC1005X55N 4422.32,1649.28 r270 top
C56 "10uF" CAPMP3216X180N 4306.02,1776.15 r90 top
C57 "100nF" CAPC1608X87N 4055.12,462.6 r90 top
C58 "100nF" CAPC1005X55N 5283.34,2456.29 r90 top
C59 "22uF" CAPC2012X135N 5028.21,2460.23 r270 top
C60 "10uF" CAPMP3216X180N 4980.32,2086.61 r180 top
C61 "22uF" CAPC2012X135N 4852.36,1259.84 r270 top
C62 "100nF" CAPC1005X55N 4616.14,1427.17 r180 top
C63 "100nF" CAPC1005X55N 5430.98,2525.19 r180 top
C64 "22uF" CAPC2012X135N 5381.76,2456.29 r0 top
C65 "10nF" CAPC1608X87N 4419.29,2027.56 r180 top
C66 "1uF" CAPC1608X87N 4763.78,187.01 r180 top
C67 "100nF" CAPC1005X55N 5673.41,1258.72 r270 top
C68 "1uF" CAPC1608X87N 4714.57,669.29 r270 top
C69 "1uF" CAPC1608X87N 5352.24,2751.57 r270 top
C70A "100nF" CAPC1005X55N 3299.21,3486.22 r0 top (schematic designator C70)
C70B "100nF" CAPC1005X55N 3299.21,3092.52 r0 top (schematic designator C70)
C70C "100nF" CAPC1005X55N 3299.71,2697.1 r0 top (schematic designator C70)
C70D "100nF" CAPC1005X55N 3299.21,2305.12 r0 top (schematic designator C70)
C70E "100nF" CAPC1005X55N 3299.21,1911.42 r0 top (schematic designator C70)
C70F "100nF" CAPC1005X55N 3299.21,1517.72 r0 top (schematic designator C70)
C70G "100nF" CAPC1005X55N 3299.21,1124.02 r0 top (schematic designator C70)
C70H "100nF" CAPC1005X55N 3299.21,730.31 r0 top (schematic designator C70)
C71A "100nF" CAPC1005X55N 3503.94,3198.82 r180 top (schematic designator C71)
C71B "100nF" CAPC1005X55N 3503.94,2805.12 r180 top (schematic designator C71)
C71C "100nF" CAPC1005X55N 3504.43,2409.69 r180 top (schematic designator C71)
C71D "100nF" CAPC1005X55N 3503.94,2017.72 r180 top (schematic designator C71)
C71E "100nF" CAPC1005X55N 3503.94,1624.02 r180 top (schematic designator C71)
C71F "100nF" CAPC1005X55N 3503.94,1230.31 r180 top (schematic designator C71)
C71G "100nF" CAPC1005X55N 3503.94,836.61 r180 top (schematic designator C71)
C71H "100nF" CAPC1005X55N 3503.94,442.91 r180 top (schematic designator C71)
C72A "82pF" CAPC2012X90N 2712,3276 r90 top (schematic designator C72)
C72B "82pF" CAPC2012X90N 2712,2882.3 r90 top (schematic designator C72)
C72C "82pF" CAPC2012X90N 2712.49,2486.87 r90 top (schematic designator C72)
C72D "82pF" CAPC2012X90N 2712,2094.9 r90 top (schematic designator C72)
C72E "82pF" CAPC2012X90N 2712,1701.2 r90 top (schematic designator C72)
C72F "82pF" CAPC2012X90N 2712,1307.5 r90 top (schematic designator C72)
C72G "82pF" CAPC2012X90N 2712,913.8 r90 top (schematic designator C72)
C72H "82pF" CAPC2012X90N 2712,520.09 r90 top (schematic designator C72)
C73A "47nF" CAPC2012X135N 3071.85,3504.92 r0 top (schematic designator C73)
C73B "47nF" CAPC2012X135N 3071.85,3111.22 r0 top (schematic designator C73)
C73C "47nF" CAPC2012X135N 3072.34,2715.8 r0 top (schematic designator C73)
C73D "47nF" CAPC2012X135N 3071.85,2323.82 r0 top (schematic designator C73)
C73E "47nF" CAPC2012X135N 3071.85,1930.12 r0 top (schematic designator C73)
C73F "47nF" CAPC2012X135N 3071.85,1536.42 r0 top (schematic designator C73)
C73G "47nF" CAPC2012X135N 3071.85,1142.72 r0 top (schematic designator C73)
C73H "47nF" CAPC2012X135N 3071.85,749.02 r0 top (schematic designator C73)
C74A "47nF" CAPC2012X135N 3401.57,3501.97 r0 top (schematic designator C74)
C74B "47nF" CAPC2012X135N 3401.57,3108.27 r0 top (schematic designator C74)
C74C "47nF" CAPC2012X135N 3402.07,2712.84 r0 top (schematic designator C74)
C74D "47nF" CAPC2012X135N 3401.57,2320.87 r0 top (schematic designator C74)
C74E "47nF" CAPC2012X135N 3401.57,1927.17 r0 top (schematic designator C74)
C74F "47nF" CAPC2012X135N 3401.57,1533.46 r0 top (schematic designator C74)
C74G "47nF" CAPC2012X135N 3401.57,1139.76 r0 top (schematic designator C74)
C74H "47nF" CAPC2012X135N 3401.57,746.06 r0 top (schematic designator C74)
C75 "47nF" CAPC2012X135N 3952.76,2783.46 r180 top
C76 "47nF" CAPC2012X135N 3769.69,2297.24 r90 top
C77 "10uF" CAPMP3216X180N 4809.06,1625.98 r270 top
C78 "Undefined" CAPC2012X135N 335.01,3741.14 r90 top
C79 "Undefined" CAPC2012X135N 324.8,321.85 r90 top
C80 "1uF" CAPC1608X87N 4135.83,1005.1 r180 top
C81 "1uF" CAPC1608X87N 4559.96,1729.75 r90 top
C82 "1uF" CAPC1608X87N 4228.97,1669.29 r90 top
C83 "10nF" CAPC1608X87N 4453.74,840.55 r180 top
C85A "18pF" CAPC1608X87N 2469.21,3421.97 r0 top (schematic designator C85)
C85B "18pF" CAPC1608X87N 2469.21,3028.27 r0 top (schematic designator C85)
C85C "18pF" CAPC1608X87N 2469.71,2632.84 r0 top (schematic designator C85)
C85D "18pF" CAPC1608X87N 2469.21,2240.87 r0 top (schematic designator C85)
C85E "18pF" CAPC1608X87N 2469.21,1847.17 r0 top (schematic designator C85)
C85F "18pF" CAPC1608X87N 2469.21,1453.46 r0 top (schematic designator C85)
C85G "18pF" CAPC1608X87N 2469.21,1059.76 r0 top (schematic designator C85)
C85H "18pF" CAPC1608X87N 2469.21,666.06 r0 top (schematic designator C85)
C88A "18pF" CAPC1608X87N 2469.21,3351.97 r0 top (schematic designator C88)
C88B "18pF" CAPC1608X87N 2469.21,2958.27 r0 top (schematic designator C88)
C88C "18pF" CAPC1608X87N 2469.71,2562.84 r0 top (schematic designator C88)
C88D "18pF" CAPC1608X87N 2469.21,2170.87 r0 top (schematic designator C88)
C88E "18pF" CAPC1608X87N 2469.21,1777.17 r0 top (schematic designator C88)
C88F "18pF" CAPC1608X87N 2469.21,1383.46 r0 top (schematic designator C88)
C88G "18pF" CAPC1608X87N 2469.21,989.76 r0 top (schematic designator C88)
C88H "18pF" CAPC1608X87N 2469.21,596.06 r0 top (schematic designator C88)
C94 "100nF" CAPC1608X87N 3839.08,3325.05 r90 top
C112 "1uF" CAPC1608X87N 4842.52,2175.2 r180 top
C114 "10nF" CAPC1608X87N 4379.92,1289.37 r0 top
C115 "10uF" CAPMP3216X180N 4409.45,1368.11 r180 top
C116 "10nF" CAPC1608X87N 4822.66,1854.52 r0 top
C117 "1uF" CAPC1608X87N 4822.83,1751.97 r180 top
C118 "10uF" CAPMP3216X180N 4483.5,1788.48 r90 top
C120 "100nF" CAPC1005X55N 5750.69,2526.13 r90 top
C121 "22uF" CAPC2012X135N 5653.69,2525.13 r0 top
C122 "100nF" CAPC1005X55N 5499.87,2790.94 r180 top
C123 "22uF" CAPC2012X135N 5431.69,2743.13 r270 top
C153 "100nF" CAPC1005X55N 4327.76,620.08 r180 top
C154 "100nF" CAPC1005X55N 5674.7,1458.66 r270 top
C156 "100nF" CAPC1005X55N 5763.35,520.66 r180 top
C157 "100nF" CAPC1005X55N 5692,777.27 r270 top
C158 "100nF" CAPC1005X55N 5684.54,948.82 r270 top
C159 "100nF" CAPC1005X55N 5672.73,1106.3 r270 top
C160 "100nF" CAPC1005X55N 5615.74,1532.21 r0 top
C161 "100nF" CAPC1005X55N 5747.76,1890.06 r0 top
C162 "100nF" CAPC1005X55N 5882.42,236.58 r90 top
CLIP6 "S1411-46R" CLIP_HOLLAND-SHIELDING_LC 1220.47,3346.46 r90 top
CLIP7 "S1411-46R" CLIP_HOLLAND-SHIELDING_LC 1220.47,629.92 r90 top
CLIP11 "S1411-46R" CLIP_HOLLAND-SHIELDING_LC 4173.23,1259.84 r90 top
CLIP12 "S1411-46R" CLIP_HOLLAND-SHIELDING_LC 4173.23,2755.91 r90 top
CLIP13 "S1411-46R" CLIP_HOLLAND-SHIELDING_LC 1220.47,1299.21 r90 top
CLIP14 "S1411-46R" CLIP_HOLLAND-SHIELDING_LC 1220.47,2047.24 r90 top
CLIP15 "S1411-46R" CLIP_HOLLAND-SHIELDING_LC 1220.47,2795.28 r90 top
CLIP16 "S1411-46R" CLIP_HOLLAND-SHIELDING_LC 1968.5,3740.16 r180 top
CLIP17 "S1411-46R" CLIP_HOLLAND-SHIELDING_LC 2874.02,3740.16 r180 top
CLIP18 "S1411-46R" CLIP_HOLLAND-SHIELDING_LC 3661.42,3740.16 r180 top
CLIP19 "S1411-46R" CLIP_HOLLAND-SHIELDING_LC 4173.23,3464.57 r90 top
CLIP20 "S1411-46R" CLIP_HOLLAND-SHIELDING_LC 4173.23,2086.61 r90 top
CLIP21 "S1411-46R" CLIP_HOLLAND-SHIELDING_LC 1496.06,196.85 r180 top
CLIP22 "S1411-46R" CLIP_HOLLAND-SHIELDING_LC 3858.27,196.85 r180 top
CLIP23 "S1411-46R" CLIP_HOLLAND-SHIELDING_LC 4173.23,511.81 r90 top
CLIP24 "S1411-46R" CLIP_HOLLAND-SHIELDING_LC 3188.98,196.85 r180 top
CLIP25 "S1411-46R" CLIP_HOLLAND-SHIELDING_LC 1968.5,196.85 r180 top
CLIP26 "S1411-46R" CLIP_HOLLAND-SHIELDING_LC 1456.69,3740.16 r180 top
D1A "BAV199" SOT95P240X110-3N 2598,3407 r270 top (schematic designator D1)
D1B "BAV199" SOT95P240X110-3N 2598,3013.3 r270 top (schematic designator D1)
D1C "BAV199" SOT95P240X110-3N 2598.49,2617.87 r270 top (schematic designator D1)
D1D "BAV199" SOT95P240X110-3N 2598,2225.9 r270 top (schematic designator D1)
D1E "BAV199" SOT95P240X110-3N 2598,1832.2 r270 top (schematic designator D1)
D1F "BAV199" SOT95P240X110-3N 2598,1438.5 r270 top (schematic designator D1)
D1G "BAV199" SOT95P240X110-3N 2598,1044.8 r270 top (schematic designator D1)
D1H "BAV199" SOT95P240X110-3N 2598,651.1 r270 top (schematic designator D1)
D2 "1N4148WS" SODFL2512X100N 4842.52,669.29 r270 top
D3A "BAV199" SOT95P240X110-3N 2598,3253 r90 top (schematic designator D3)
D3B "BAV199" SOT95P240X110-3N 2598,2859.3 r90 top (schematic designator D3)
D3C "BAV199" SOT95P240X110-3N 2598.49,2463.87 r90 top (schematic designator D3)
D3D "BAV199" SOT95P240X110-3N 2598,2071.9 r90 top (schematic designator D3)
D3E "BAV199" SOT95P240X110-3N 2598,1678.19 r90 top (schematic designator D3)
D3F "BAV199" SOT95P240X110-3N 2598,1284.5 r90 top (schematic designator D3)
D3G "BAV199" SOT95P240X110-3N 2598,890.79 r90 top (schematic designator D3)
D3H "BAV199" SOT95P240X110-3N 2598,497.09 r90 top (schematic designator D3)
D4 "1N4148WS" SODFL2512X100N 5243.97,2751.57 r0 top
D5 "1N4148WS" SODFL2512X100N 4773.62,255.91 r180 top
D6 "1N4148WS" SODFL2512X100N 4852.36,2007.87 r180 top
D7 "PRTR5V0U2X" SOT190P230X110-4N 6035.15,516.27 r270 top
D8 "SMBJ12A" DIOM5336X265N 3222.44,3631.89 r0 top
D9 "SMBJ12A" DIOM5336X265N 2874.02,314.96 r180 top
D10 "PRTR5V0U2X" SOT190P230X110-4N 5447.2,463.91 r0 top
FTG1 "Use only in PCB" FIDUCIAL_TOP_C100-200 5973.43,3747.05 r270 top
FTG2 "Use only in PCB" FIDUCIAL_TOP_C100-200 5971.46,3743.11 r270 bottom
FTG3 "Use only in PCB" FIDUCIAL_TOP_S100-200 571.85,205.71 r270 bottom
FTG4 "Use only in PCB" FIDUCIAL_TOP_S100-200 6174.62,420.28 r270 bottom
FTG5 "Use only in PCB" FIDUCIAL_TOP_S100-200 6175.57,420.28 r270 top
FTG6 "Use only in PCB" FIDUCIAL_TOP_S100-200 573.82,203.74 r270 top
IC1 "LTC6655BHMS8-4.096#PBF" SOP65P490X110-8N 4008.86,859.25 r90 top
IC2 "LTC2320HUKG-16#PBF" QFN50P700X800X80_HS-53M 3904.33,1674.62 r0 top
IC3 "CC6-1212DF-E" CC6-1212DF-E 5833.46,2863.58 r180 top
IC4 "LT1761ES5-BYP#TRMPBF" SOT95P280X100-5N 4675.2,1834.21 r180 top
IC5 "OPA2197IDGKR" SOP65P490X110-8N 3954.72,2444.88 r0 top
IC6A "AD8253ARMZ" SOP50P490X110-10N 2828,3342 r90 top (schematic designator IC6)
IC6B "AD8253ARMZ" SOP50P490X110-10N 2828,2948.3 r90 top (schematic designator IC6)
IC6C "AD8253ARMZ" SOP50P490X110-10N 2828.49,2552.87 r90 top (schematic designator IC6)
IC6D "AD8253ARMZ" SOP50P490X110-10N 2828,2160.9 r90 top (schematic designator IC6)
IC6E "AD8253ARMZ" SOP50P490X110-10N 2828,1767.2 r90 top (schematic designator IC6)
IC6F "AD8253ARMZ" SOP50P490X110-10N 2828,1373.5 r90 top (schematic designator IC6)
IC6G "AD8253ARMZ" SOP50P490X110-10N 2828,979.8 r90 top (schematic designator IC6)
IC6H "AD8253ARMZ" SOP50P490X110-10N 2828,586.1 r90 top (schematic designator IC6)
IC7 "LT1761ES5-BYP#TRMPBF" SOT95P280X100-5N 4503.96,1541.31 r90 top
IC8 "TPS62175DQC" SON50P200X300X80-11N-R94X250 5322.71,2564.56 r180 top
IC9 "24AA02E48T-I/OT" SOT95P280X145-5N 5137.26,379.36 r90 top
IC10 "SN74LV595APWT" SOP65P640X120-16N 3983.64,3223.12 r90 top
IC11 "SN74LV595APWT" SOP65P640X120-16N 3858.46,416.6 r0 top
IC12A "OPA2197IDGKR" SOP65P490X110-8N 3405.51,3316.09 r90 top (schematic designator IC12)
IC12B "OPA2197IDGKR" SOP65P490X110-8N 3405.51,2922.39 r90 top (schematic designator IC12)
IC12C "OPA2197IDGKR" SOP65P490X110-8N 3406.01,2526.96 r90 top (schematic designator IC12)
IC12D "OPA2197IDGKR" SOP65P490X110-8N 3405.51,2134.98 r90 top (schematic designator IC12)
IC12E "OPA2197IDGKR" SOP65P490X110-8N 3405.51,1741.28 r90 top (schematic designator IC12)
IC12F "OPA2197IDGKR" SOP65P490X110-8N 3405.51,1347.58 r90 top (schematic designator IC12)
IC12G "OPA2197IDGKR" SOP65P490X110-8N 3405.51,953.88 r90 top (schematic designator IC12)
IC12H "OPA2197IDGKR" SOP65P490X110-8N 3405.51,560.18 r90 top (schematic designator IC12)
IC13 "LT1763CS8#PBF" SOIC127P600X175-8N 4631.85,2100.37 r0 top
IC14 "LT1964ES5-SD#TRMPBF" SOT95P280X100-5N 4616.14,1102.36 r180 top
IC15 "LM393AD" SOIC127P600X175-8N 4812.99,442.91 r270 top
IC16 "LT1763CS8#PBF" SOIC127P600X175-8N 4665.35,1299.21 r0 top
IC17 "SN65LVDS2DBVR" SOT95P280X145-5N 5765.63,1121.87 r90 top
IC18 "SN65LVDS2DBVR" SOT95P280X145-5N 5774.94,952.11 r90 top
IC19 "SN65LVDS1DBVT" SOT95P280X145-5N 5774.5,787.28 r90 top
IC20 "SN65LVDS2DBVR" SOT95P280X145-5N 5779.78,623.01 r90 top
IC21 "FIN1101K8X" SOP50P310X90-8N 5768.01,1777.73 r270 top
IC22 "FIN1101K8X" SOP50P310X90-8N 5620.95,1642.94 r90 top
IC23 "SN65LVDS2DBVR" SOT95P280X145-5N 5762.94,1288.82 r90 top
IC24 "SN65LVDS2DBVR" SOT95P280X145-5N 5766.34,1463 r90 top
IC25 "FIN1101K8X" SOP50P310X90-8N 5621.34,1912.48 r90 top
IC26 "TPS62175DQC" SON50P200X300X80-11N-R94X250 5541.28,2698.21 r0 top
IC27 "FIN1101K8X" SOP50P310X90-8N 5108.17,1773.19 r90 top
IC28 "FIN1101K8X" SOP50P310X90-8N 5111.19,1502.52 r90 top
IC29 "FIN1101K8X" SOP50P310X90-8N 5099.94,1182.13 r90 top
IC30 "FIN1101K8X" SOP50P310X90-8N 5102.1,958.81 r90 top
IC31 "LTC6655CHLS8-4.096" LCCS127P500X500X145-8N 3809.06,856.45 r90 top
IC32 "LT1761ES5-SD#TRMPBF" SOT95P280X100-5N 4677.17,1694.27 r180 top
IC33 "LT1761ES5-SD#TRMPBF" SOT95P280X100-5N 4322.83,1586.7 r90 top
IC34 "LT1964EDD#PBF" LT-DD-8_V 4453.74,935.18 r0 top
IC38 "PCF8574ADW" SOIC127P1030X265-16N 4458.66,364.17 r90 top
IC40 "24AA02E48T-I/OT" SOT95P280X145-5N 5783.41,247.63 r90 top
J1 "Header 26" 3M_N2526-6002RB 944.88,2007.87 r90 top
J2 "" 3M_N2530-6002RB 5339.12,1497.79 r270 top
J3 "BNC" RENHOTEC_RHT-610-0049 236.22,3078.98 r180 top
J4 "BNC" RENHOTEC_RHT-610-0049 236.22,2370.32 r180 top
J5 "BNC" RENHOTEC_RHT-610-0049 236.22,1661.66 r180 top
J6 "BNC" RENHOTEC_RHT-610-0049 236.22,953 r180 top
J13 "" 3M_N2530-6002RB 6078.12,1496.79 r270 top
L1 "10uH" IND_MURATA-PS_8400 5713.64,2293.25 r270 top
L2A "2x6.5mH" IND_WURTH_WE-SL2 2089.21,3373.77 r0 top (schematic designator L2)
L2B "2x6.5mH" IND_WURTH_WE-SL2 2089.21,2980.07 r0 top (schematic designator L2)
L2C "2x6.5mH" IND_WURTH_WE-SL2 2089.71,2584.65 r0 top (schematic designator L2)
L2D "2x6.5mH" IND_WURTH_WE-SL2 2089.21,2192.67 r0 top (schematic designator L2)
L2E "2x6.5mH" IND_WURTH_WE-SL2 2089.21,1798.97 r0 top (schematic designator L2)
L2F "2x6.5mH" IND_WURTH_WE-SL2 2089.21,1405.27 r0 top (schematic designator L2)
L2G "2x6.5mH" IND_WURTH_WE-SL2 2089.21,1011.57 r0 top (schematic designator L2)
L2H "2x6.5mH" IND_WURTH_WE-SL2 2089.21,617.87 r0 top (schematic designator L2)
L3 "10uH" IND_MURATA-PS_8400 5152.32,2512.39 r270 top
L4 "10uH" IND_MURATA-PS_8400 5046.54,2230.32 r180 top
L5 "10uH" IND_MURATA-PS_8400 5697.69,2691.13 r270 top
L6 "10uH" IND_MURATA-PS_8400 6008.03,2563.58 r90 top
L10 "10uH" IND_MURATA-PS_8400 4744.09,3336.61 r270 top
L11 "10uH" IND_MURATA-PS_8400 4734.25,2933.07 r270 top
L12 "10uH" IND_MURATA-PS_8400 4901.57,2509.84 r270 top
L13 "10uH" IND_MURATA-PS_8400 4744.09,2687.01 r90 top
LD1 "Green/Green" LED_DIALIGHT_571-0122F 108.27,2726.38 r0 top
LD2 "Green/Green" LED_DIALIGHT_571-0122F 108.27,2017.72 r0 top
LD3 "Green/Green" LED_DIALIGHT_571-0122F 108.27,1309.06 r0 top
LD4 "Green/Green" LED_DIALIGHT_571-0122F 108.27,600.39 r0 top
LD5 "Green/Green" LED_DIALIGHT_571-0122F 108.27,3513.78 r0 top
NUT1 "BNC Nut" TE_1-329631-2 -389.76,3078.98 r0 top
NUT2 "BNC Nut" TE_1-329631-2 -373.03,1665.35 r0 top
NUT3 "BNC Nut" TE_1-329631-2 -370.08,948.82 r0 top
NUT4 "BNC Nut" TE_1-329631-2 -379.92,2375.98 r0 top
NUT5 "BNC Nut" TE_1-329631-2 -368.11,947.83 r0 top
NUT6 "BNC Nut" TE_1-329631-2 -373.03,1664.37 r0 top
NUT7 "BNC Nut" TE_1-329631-2 -380.91,2375.98 r0 top
NUT8 "BNC Nut" TE_1-329631-2 -389.76,3080.71 r0 top
R1 "0" RESC1005X40N 3996.24,1025.91 r90 top
R2 "1k" RESC1608X55N 4713.2,834.01 r270 top
R3 "Undefined" RESC1608X55N 4291.34,3385.83 r270 top
R4A "49R9" RESC6331X70N 1820.87,3398.62 r90 top (schematic designator R4)
R4B "49R9" RESC6331X70N 1820.87,3004.92 r90 top (schematic designator R4)
R4C "49R9" RESC6331X70N 1821.36,2609.5 r90 top (schematic designator R4)
R4D "49R9" RESC6331X70N 1820.87,2217.52 r90 top (schematic designator R4)
R4E "49R9" RESC6331X70N 1820.87,1823.82 r90 top (schematic designator R4)
R4F "49R9" RESC6331X70N 1820.87,1430.12 r90 top (schematic designator R4)
R4G "49R9" RESC6331X70N 1820.87,1036.42 r90 top (schematic designator R4)
R4H "49R9" RESC6331X70N 1820.87,642.72 r90 top (schematic designator R4)
R5 "10k" RESC1005X40N 562.01,3729.33 r180 top
R6 "Undefined" RESC1608X55N 4409.45,3385.83 r270 top
R7 "Undefined" RESC1608X55N 4940.94,3011.81 r270 top
R8 "0" RESC1005X40N 6072.83,3287.4 r90 top
R9 "100" RESC1005X40N 4084.65,1899.61 r270 top
R10 "0" RESC1005X40N 3996.06,2027.56 r0 top
R11 "82k" RESC1608X55N 4053.15,1420.28 r90 top
R12 "10k" RESC1005X40N 618.11,3711.61 r270 top
R13 "10k" RESC1005X40N 767.72,3711.61 r270 top
R14A "51" RESC1005X40N 3510.2,3270.72 r90 top (schematic designator R14)
R14B "51" RESC1005X40N 3510.2,2877.02 r90 top (schematic designator R14)
R14C "51" RESC1005X40N 3510.7,2481.59 r90 top (schematic designator R14)
R14D "51" RESC1005X40N 3510.2,2089.61 r90 top (schematic designator R14)
R14E "51" RESC1005X40N 3510.2,1695.91 r90 top (schematic designator R14)
R14F "51" RESC1005X40N 3510.2,1302.21 r90 top (schematic designator R14)
R14G "51" RESC1005X40N 3510.2,908.51 r90 top (schematic designator R14)
R14H "51" RESC1005X40N 3510.2,514.81 r90 top (schematic designator R14)
R15 "0" RESC1005X40N 4017.24,713.91 r180 top
R16A "51" RESC1005X40N 3510.2,3438.04 r270 top (schematic designator R16)
R16B "51" RESC1005X40N 3510.2,3044.34 r270 top (schematic designator R16)
R16C "51" RESC1005X40N 3510.7,2648.91 r270 top (schematic designator R16)
R16D "51" RESC1005X40N 3510.2,2256.94 r270 top (schematic designator R16)
R16E "51" RESC1005X40N 3510.2,1863.24 r270 top (schematic designator R16)
R16F "51" RESC1005X40N 3510.2,1469.54 r270 top (schematic designator R16)
R16G "51" RESC1005X40N 3510.2,1075.83 r270 top (schematic designator R16)
R16H "51" RESC1005X40N 3510.2,682.13 r270 top (schematic designator R16)
R17 "100" RESC1005X40N 5041.69,1763.81 r90 top
R18 "2k7" RESC1608X55N 4865.16,952.76 r0 top
R19 "36k" RESC1608X55N 4935.79,3150.36 r270 top
R20 "270k" RESC1608X55N 5558.93,2515.35 r270 top
R21 "82k" RESC1608X55N 5499.87,2564.56 r90 top
R22 "10k" RESC1005X40N 4773.62,669.29 r270 top
R23 "2k4" RESC1005X40N 4901.57,669.29 r90 top
R24 "33k" RESC1005X40N 5430.98,2584.24 r0 top
R25 "62k" RESC1005X40N 4458.66,1279.53 r270 top
R26 "24k" RESC1608X55N 4557.99,1842.52 r270 top
R27 "5k1" RESC1005X40N 4621.06,1937.46 r270 top
R28 "5k1" RESC1005X40N 5430.98,2623.61 r180 top
R29 "20k" RESC1005X40N 4498.03,1279.53 r90 top
R30 "100" RESC1005X40N 5842.83,1783.61 r270 top
R31 "100" RESC1005X40N 5865.29,1282.94 r270 top
R32 "24k" RESC1608X55N 4498.03,1102.36 r270 top
R33A "0" RESC1608X55N 2319.21,3451.97 r90 top (schematic designator R33)
R33B "0" RESC1608X55N 2319.21,3058.27 r90 top (schematic designator R33)
R33C "0" RESC1608X55N 2319.71,2662.84 r90 top (schematic designator R33)
R33D "0" RESC1608X55N 2319.21,2270.87 r90 top (schematic designator R33)
R33E "0" RESC1608X55N 2319.21,1877.17 r90 top (schematic designator R33)
R33F "0" RESC1608X55N 2319.21,1483.46 r90 top (schematic designator R33)
R33G "0" RESC1608X55N 2319.21,1089.76 r90 top (schematic designator R33)
R33H "0" RESC1608X55N 2319.21,696.06 r90 top (schematic designator R33)
R34A "1k8" RESC1608X55N 2469.21,3481.97 r0 top (schematic designator R34)
R34B "1k8" RESC1608X55N 2469.21,3088.27 r0 top (schematic designator R34)
R34C "1k8" RESC1608X55N 2469.71,2692.84 r0 top (schematic designator R34)
R34D "1k8" RESC1608X55N 2469.21,2300.87 r0 top (schematic designator R34)
R34E "1k8" RESC1608X55N 2469.21,1907.17 r0 top (schematic designator R34)
R34F "1k8" RESC1608X55N 2469.21,1513.46 r0 top (schematic designator R34)
R34G "1k8" RESC1608X55N 2469.21,1119.76 r0 top (schematic designator R34)
R34H "1k8" RESC1608X55N 2469.21,726.06 r0 top (schematic designator R34)
R35A "100k" RESC1608X55N 2379.21,3451.97 r90 top (schematic designator R35)
R35B "100k" RESC1608X55N 2379.21,3058.27 r90 top (schematic designator R35)
R35C "100k" RESC1608X55N 2379.71,2662.84 r90 top (schematic designator R35)
R35D "100k" RESC1608X55N 2379.21,2270.87 r90 top (schematic designator R35)
R35E "100k" RESC1608X55N 2379.21,1877.16 r90 top (schematic designator R35)
R35F "100k" RESC1608X55N 2379.21,1483.46 r90 top (schematic designator R35)
R35G "100k" RESC1608X55N 2379.21,1089.76 r90 top (schematic designator R35)
R35H "100k" RESC1608X55N 2379.21,696.06 r90 top (schematic designator R35)
R36 "100" RESC1005X40N 5867.97,1125.83 r270 top
R37A "Undefined" RESC1608X55N 2099.21,3283.77 r0 top (schematic designator R37)
R37B "Undefined" RESC1608X55N 2099.21,2890.07 r0 top (schematic designator R37)
R37C "Undefined" RESC1608X55N 2099.71,2494.65 r0 top (schematic designator R37)
R37D "Undefined" RESC1608X55N 2099.21,2102.67 r0 top (schematic designator R37)
R37E "Undefined" RESC1608X55N 2099.21,1708.97 r0 top (schematic designator R37)
R37F "Undefined" RESC1608X55N 2099.21,1315.27 r0 top (schematic designator R37)
R37G "Undefined" RESC1608X55N 2099.21,921.57 r0 top (schematic designator R37)
R37H "Undefined" RESC1608X55N 2099.21,527.87 r0 top (schematic designator R37)
R38 "2k7" RESC1608X55N 4409.45,1131.89 r0 top
R39 "100" RESC1005X40N 5867.45,946.23 r270 top
R40 "100" RESC1005X40N 5864.66,627.95 r270 top
R41A "0" RESC1608X55N 2319.21,3331.97 r270 top (schematic designator R41)
R41B "0" RESC1608X55N 2319.21,2938.27 r270 top (schematic designator R41)
R41C "0" RESC1608X55N 2319.71,2542.84 r270 top (schematic designator R41)
R41D "0" RESC1608X55N 2319.21,2150.87 r270 top (schematic designator R41)
R41E "0" RESC1608X55N 2319.21,1757.16 r270 top (schematic designator R41)
R41F "0" RESC1608X55N 2319.21,1363.46 r270 top (schematic designator R41)
R41G "0" RESC1608X55N 2319.21,969.76 r270 top (schematic designator R41)
R41H "0" RESC1608X55N 2319.21,576.06 r270 top (schematic designator R41)
R42A "1k8" RESC1608X55N 2469.21,3291.97 r0 top (schematic designator R42)
R42B "1k8" RESC1608X55N 2469.21,2898.27 r0 top (schematic designator R42)
R42C "1k8" RESC1608X55N 2469.71,2502.84 r0 top (schematic designator R42)
R42D "1k8" RESC1608X55N 2469.21,2110.87 r0 top (schematic designator R42)
R42E "1k8" RESC1608X55N 2469.21,1717.17 r0 top (schematic designator R42)
R42F "1k8" RESC1608X55N 2469.21,1323.46 r0 top (schematic designator R42)
R42G "1k8" RESC1608X55N 2469.21,929.76 r0 top (schematic designator R42)
R42H "1k8" RESC1608X55N 2469.21,536.06 r0 top (schematic designator R42)
R43A "100k" RESC1608X55N 2379.21,3331.97 r270 top (schematic designator R43)
R43B "100k" RESC1608X55N 2379.21,2938.27 r270 top (schematic designator R43)
R43C "100k" RESC1608X55N 2379.71,2542.84 r270 top (schematic designator R43)
R43D "100k" RESC1608X55N 2379.21,2150.87 r270 top (schematic designator R43)
R43E "100k" RESC1608X55N 2379.21,1757.16 r270 top (schematic designator R43)
R43F "100k" RESC1608X55N 2379.21,1363.46 r270 top (schematic designator R43)
R43G "100k" RESC1608X55N 2379.21,969.76 r270 top (schematic designator R43)
R43H "100k" RESC1608X55N 2379.21,576.06 r270 top (schematic designator R43)
R44 "100" RESC1005X40N 5550.87,1912.65 r90 top
R45 "100" RESC1005X40N 5040.9,1495.14 r90 top
R46 "100" RESC1005X40N 5030.08,1180.76 r90 top
R47 "100" RESC1005X40N 5031.83,960.43 r90 top
R48 "62k" RESC1005X40N 4685.04,561.02 r90 top
R49 "10k" RESC1005X40N 923.23,3713.58 r270 top
R50A "2k4" RESC1005X40N 3503.94,3516.73 r180 top (schematic designator R50)
R50B "2k4" RESC1005X40N 3503.94,3123.03 r180 top (schematic designator R50)
R50C "2k4" RESC1005X40N 3504.43,2727.61 r180 top (schematic designator R50)
R50D "2k4" RESC1005X40N 3503.94,2335.63 r180 top (schematic designator R50)
R50E "2k4" RESC1005X40N 3503.94,1941.93 r180 top (schematic designator R50)
R50F "2k4" RESC1005X40N 3503.94,1548.23 r180 top (schematic designator R50)
R50G "2k4" RESC1005X40N 3503.94,1154.53 r180 top (schematic designator R50)
R50H "2k4" RESC1005X40N 3503.94,760.83 r180 top (schematic designator R50)
R51 "5k1" RESC1005X40N 4862.2,255.91 r90 top
R52 "24k" RESC1608X55N 4950.79,442.91 r90 top
R53 "51k" RESC1005X40N 4478.35,1643.7 r180 top
R54 "47k" RESC1005X40N 4557.09,1643.7 r180 top
R55 "100" RESC1005X40N 5858.85,1466.96 r270 top
R56 "24k" RESC1608X55N 5238.06,2673.81 r180 top
R57 "5k1" RESC1005X40N 5578.61,2603.93 r180 top
R58 "220" RESC1608X55N 501.97,3474.41 r90 top
R59 "220" RESC1608X55N 590.55,3484.25 r0 top
R60 "220" RESC1608X55N 718.5,3480.32 r0 top
R61 "220" RESC1608X55N 885.83,3480.32 r0 top
R62 "220" RESC1608X55N 718.5,600.39 r270 top
R63 "220" RESC1608X55N 866.14,600.39 r270 top
R64 "220" RESC1608X55N 285.43,492.13 r0 top
R65 "220" RESC1608X55N 551.18,580.71 r0 top
R66 "220" RESC1608X55N 718.5,3779.53 r0 top
R67 "220" RESC1608X55N 600.39,3779.53 r0 top
R68 "10k" RESC1005X40N 682.09,344.49 r90 top
R69 "10k" RESC1005X40N 816.93,343.5 r90 top
R70 "10k" RESC1005X40N 380.91,330.71 r90 top
R71 "10k" RESC1005X40N 547.24,343.5 r90 top
R72 "24k" RESC1608X55N 3956.69,2848.43 r180 top
R73A "24k" RESC1608X55N 3198.82,3503.94 r180 top (schematic designator R73)
R73B "24k" RESC1608X55N 3197.83,3111.22 r180 top (schematic designator R73)
R73C "24k" RESC1608X55N 3198.82,2715.55 r180 top (schematic designator R73)
R73D "24k" RESC1608X55N 3198.82,2319.88 r180 top (schematic designator R73)
R73E "24k" RESC1608X55N 3198.82,1929.13 r180 top (schematic designator R73)
R73F "24k" RESC1608X55N 3197.83,1536.42 r180 top (schematic designator R73)
R73G "24k" RESC1608X55N 3198.82,1141.73 r180 top (schematic designator R73)
R73H "24k" RESC1608X55N 3197.83,748.03 r180 top (schematic designator R73)
R74 "Undefined" RESC1608X55N 4322.83,3507.87 r0 top
R75 "0" RESC1608X55N 323.82,3626.86 r180 top
R76 "0" RESC1608X55N 368.18,221.46 r180 top
R77 "0" RESC1005X40N 4125,936.04 r270 top
R86A "Undefined" RESC1608X55N 2099.21,3463.77 r0 top (schematic designator R86)
R86B "Undefined" RESC1608X55N 2099.21,3070.07 r0 top (schematic designator R86)
R86C "Undefined" RESC1608X55N 2099.71,2674.65 r0 top (schematic designator R86)
R86D "Undefined" RESC1608X55N 2099.21,2282.67 r0 top (schematic designator R86)
R86E "Undefined" RESC1608X55N 2099.21,1888.97 r0 top (schematic designator R86)
R86F "Undefined" RESC1608X55N 2099.21,1495.27 r0 top (schematic designator R86)
R86G "Undefined" RESC1608X55N 2099.21,1101.57 r0 top (schematic designator R86)
R86H "Undefined" RESC1608X55N 2099.21,707.87 r0 top (schematic designator R86)
R142 "24k" RESC1608X55N 4419.29,2125.98 r180 top
R143 "2k7" RESC1608X55N 4419.29,2185.04 r0 top
RN1A "10k 5K 5K 10K" SOIC127P600X175-8N 3011,3318 r90 top (schematic designator RN1)
RN1B "10k 5K 5K 10K" SOIC127P600X175-8N 3011,2924.3 r90 top (schematic designator RN1)
RN1C "10k 5K 5K 10K" SOIC127P600X175-8N 3011.49,2528.87 r90 top (schematic designator RN1)
RN1D "10k 5K 5K 10K" SOIC127P600X175-8N 3011,2136.9 r90 top (schematic designator RN1)
RN1E "10k 5K 5K 10K" SOIC127P600X175-8N 3011,1743.2 r90 top (schematic designator RN1)
RN1F "10k 5K 5K 10K" SOIC127P600X175-8N 3011,1349.5 r90 top (schematic designator RN1)
RN1G "10k 5K 5K 10K" SOIC127P600X175-8N 3011,955.8 r90 top (schematic designator RN1)
RN1H "10k 5K 5K 10K" SOIC127P600X175-8N 3011,562.09 r90 top (schematic designator RN1)
RN2A "10k 5K 5K 10K" SOIC127P600X175-8N 3227.77,3317.93 r270 top (schematic designator RN2)
RN2B "10k 5K 5K 10K" SOIC127P600X175-8N 3227.77,2924.23 r270 top (schematic designator RN2)
RN2C "10k 5K 5K 10K" SOIC127P600X175-8N 3228.27,2528.8 r270 top (schematic designator RN2)
RN2D "10k 5K 5K 10K" SOIC127P600X175-8N 3227.77,2136.83 r270 top (schematic designator RN2)
RN2E "10k 5K 5K 10K" SOIC127P600X175-8N 3227.77,1743.13 r270 top (schematic designator RN2)
RN2F "10k 5K 5K 10K" SOIC127P600X175-8N 3227.77,1349.43 r270 top (schematic designator RN2)
RN2G "10k 5K 5K 10K" SOIC127P600X175-8N 3227.77,955.72 r270 top (schematic designator RN2)
RN2H "10k 5K 5K 10K" SOIC127P600X175-8N 3227.77,562.02 r270 top (schematic designator RN2)
RN3 "10k 5K 5K 10K" SOIC127P600X175-8N 3959.65,2258.86 r180 top
RN4 "10k 5K 5K 10K" SOIC127P600X175-8N 3952.76,2634.84 r180 top
SW1A "Switch" SW_CTS_204-121ST 1529.21,3363.77 r270 top (schematic designator SW1)
SW1B "Switch" SW_CTS_204-121ST 1529.21,2970.07 r270 top (schematic designator SW1)
SW1C "Switch" SW_CTS_204-121ST 1529.71,2574.65 r270 top (schematic designator SW1)
SW1D "Switch" SW_CTS_204-121ST 1529.21,2182.67 r270 top (schematic designator SW1)
SW1E "Switch" SW_CTS_204-121ST 1529.21,1788.97 r270 top (schematic designator SW1)
SW1F "Switch" SW_CTS_204-121ST 1529.21,1395.27 r270 top (schematic designator SW1)
SW1G "Switch" SW_CTS_204-121ST 1529.21,1001.57 r270 top (schematic designator SW1)
SW1H "Switch" SW_CTS_204-121ST 1529.21,607.86 r270 top (schematic designator SW1)
T1 "BSS138LT1G" SOT95P240X110-3N 442.91,3651.57 r270 top
T2 "BSS138LT1G" SOT95P240X110-3N 580.71,3592.52 r270 top
T3 "BSS138LT1G" SOT95P240X110-3N 728.35,3588.58 r270 top
T4 "BSS138LT1G" SOT95P240X110-3N 885.83,3588.58 r270 top
T5 "BSS138LT1G" SOT95P240X110-3N 718.5,462.6 r90 top
T6 "BSS138LT1G" SOT95P240X110-3N 866.14,462.6 r90 top
T7 "BSS138LT1G" SOT95P240X110-3N 423.23,452.76 r90 top
T8 "BSS138LT1G" SOT95P240X110-3N 580.71,462.6 r90 top
T9 "BSS138LT1G" SOT95P240X110-3N 4824.2,842.01 r180 top
TP1 "Test Point" TPS127 5767.45,456.49 r0 top
TP2 "Test Point" TPS127 5768.45,375.49 r0 top
TP3 "Test Point" TPS127 5176.63,212.04 r0 top
TP4 "Test Point" TPS127 5097.89,212.04 r0 top
TP5 "Test Point" TPS127 5246.51,431.53 r0 top
TP6 "Test Point" TPS127 5642.68,381.89 r0 top
TP7 "Test Point" TPS127 4311.02,2037.4 r0 top
TP8 "Test Point" TPS127 4398.83,1737.89 r0 top
TP9 "Test Point" TPS127 4311.02,1151.57 r0 top
TP10 "Test Point" TPS127 4672.91,1560.63 r90 top
TP11 "Test Point" TPS127 5831.24,2104.33 r90 top
TP12 "Test Point" TPS127 4931.1,1230.31 r90 top
TP13 "Test Point" TPS127 4636.31,823.29 r90 top
WASHER1 "D15.8d12.75" TE_1-1634817-0 -302.17,958.66 r0 top
WASHER2 "D15.8d12.75" TE_1-1634817-0 -305.12,1665.35 r0 top
WASHER3 "D15.8d12.75" TE_1-1634817-0 -312.01,2369.09 r0 top
WASHER4 "D15.8d12.75" TE_1-1634817-0 -319.88,3077.76 r0 top
WASHER5 "D15.8d12.75" TE_1-1634817-0 -302.17,959.65 r0 top
WASHER6 "D15.8d12.75" TE_1-1634817-0 -304.13,1664.37 r0 top
WASHER7 "D15.8d12.75" TE_1-1634817-0 -312.01,2369.09 r0 top
WASHER8 "D15.8d12.75" TE_1-1634817-0 -319.88,3077.76 r0 top

## Footprints (in the part's own frame and the unit in brackets; to place one, negate y for a bottom-side part, rotate by r counter-clockwise, add the part's x,y. Pads: shape width x height; smd on the part's side, far side on the other; paste and mask are expansions set on the pad)
3M_N2526-6002RB [mm] "26 Contacts - Straight .100\" x .100\" Low Profile Four-Wall Header"
  round 1.6 hole 1: 1(-15.24,-1.27) 2(-15.24,1.27) 3(-12.7,-1.27) 4(-12.7,1.27) 5(-10.16,-1.27) 6(-10.16,1.27) 7(-7.62,-1.27) 8(-7.62,1.27) 9(-5.08,-1.27) 10(-5.08,1.27) 11(-2.54,-1.27) 12(-2.54,1.27) 13(0,-1.27) 14(0,1.27) 15(2.54,-1.27) 16(2.54,1.27) 17(5.08,-1.27) 18(5.08,1.27) 19(7.62,-1.27) 20(7.62,1.27) 21(10.16,-1.27) 22(10.16,1.27) 23(12.7,-1.27) 24(12.7,1.27) 25(15.24,-1.27) 26(15.24,1.27)
  silkscreen extent -20.17,-4.85 20.17,4.52, body extent -20.17,-4.11 20.17,4.52, height 9.91